# Altium PCB PROC106B_ASCII.PcbDoc (part 1 of 8)
Units mil, origin at the board's own origin, x right, y up, seen from the top; angles counter-clockwise.
Board outline 4498.18 x 1060.53 mil, 8 copper layers (Top Layer, GND1, Sig1, PWR1, PWR2, Sig2, GND2, Bottom Layer), stack 69.602 mil thick; 439 components, 327 nets, 1548 pads, 843 vias.
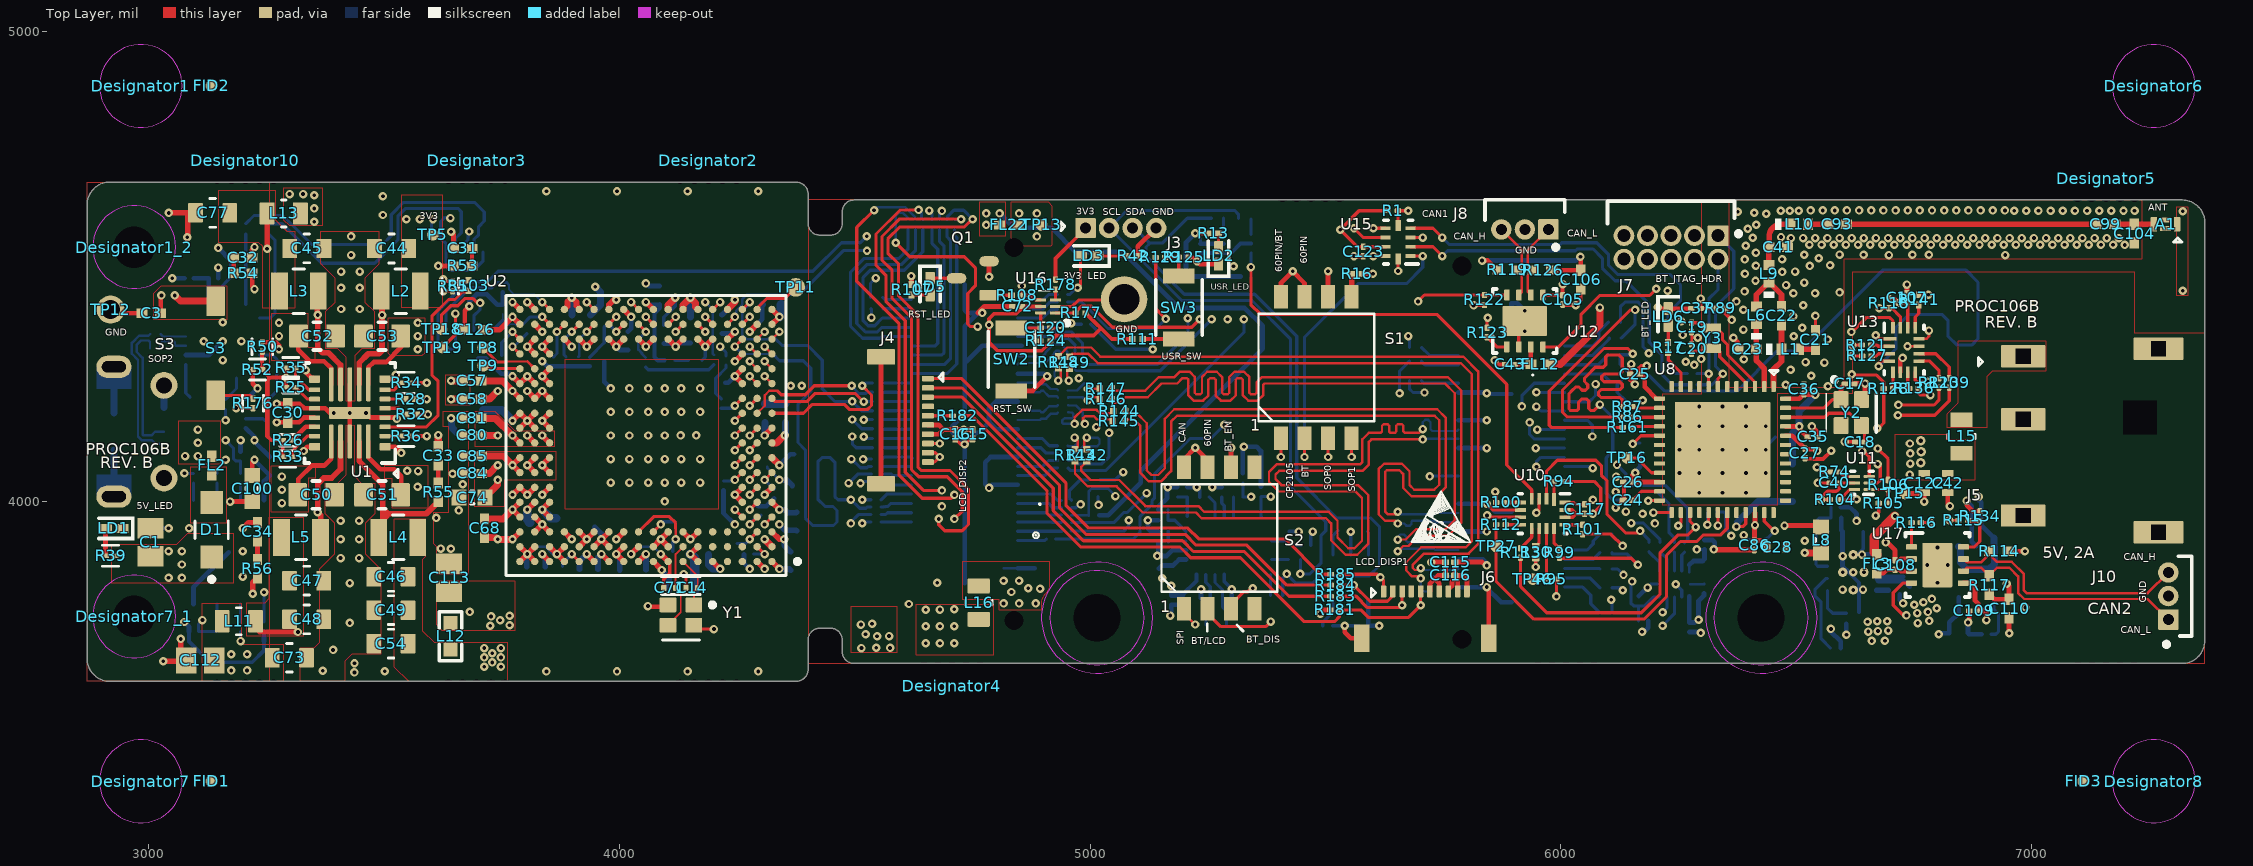
[diagram p0: Top Layer view]
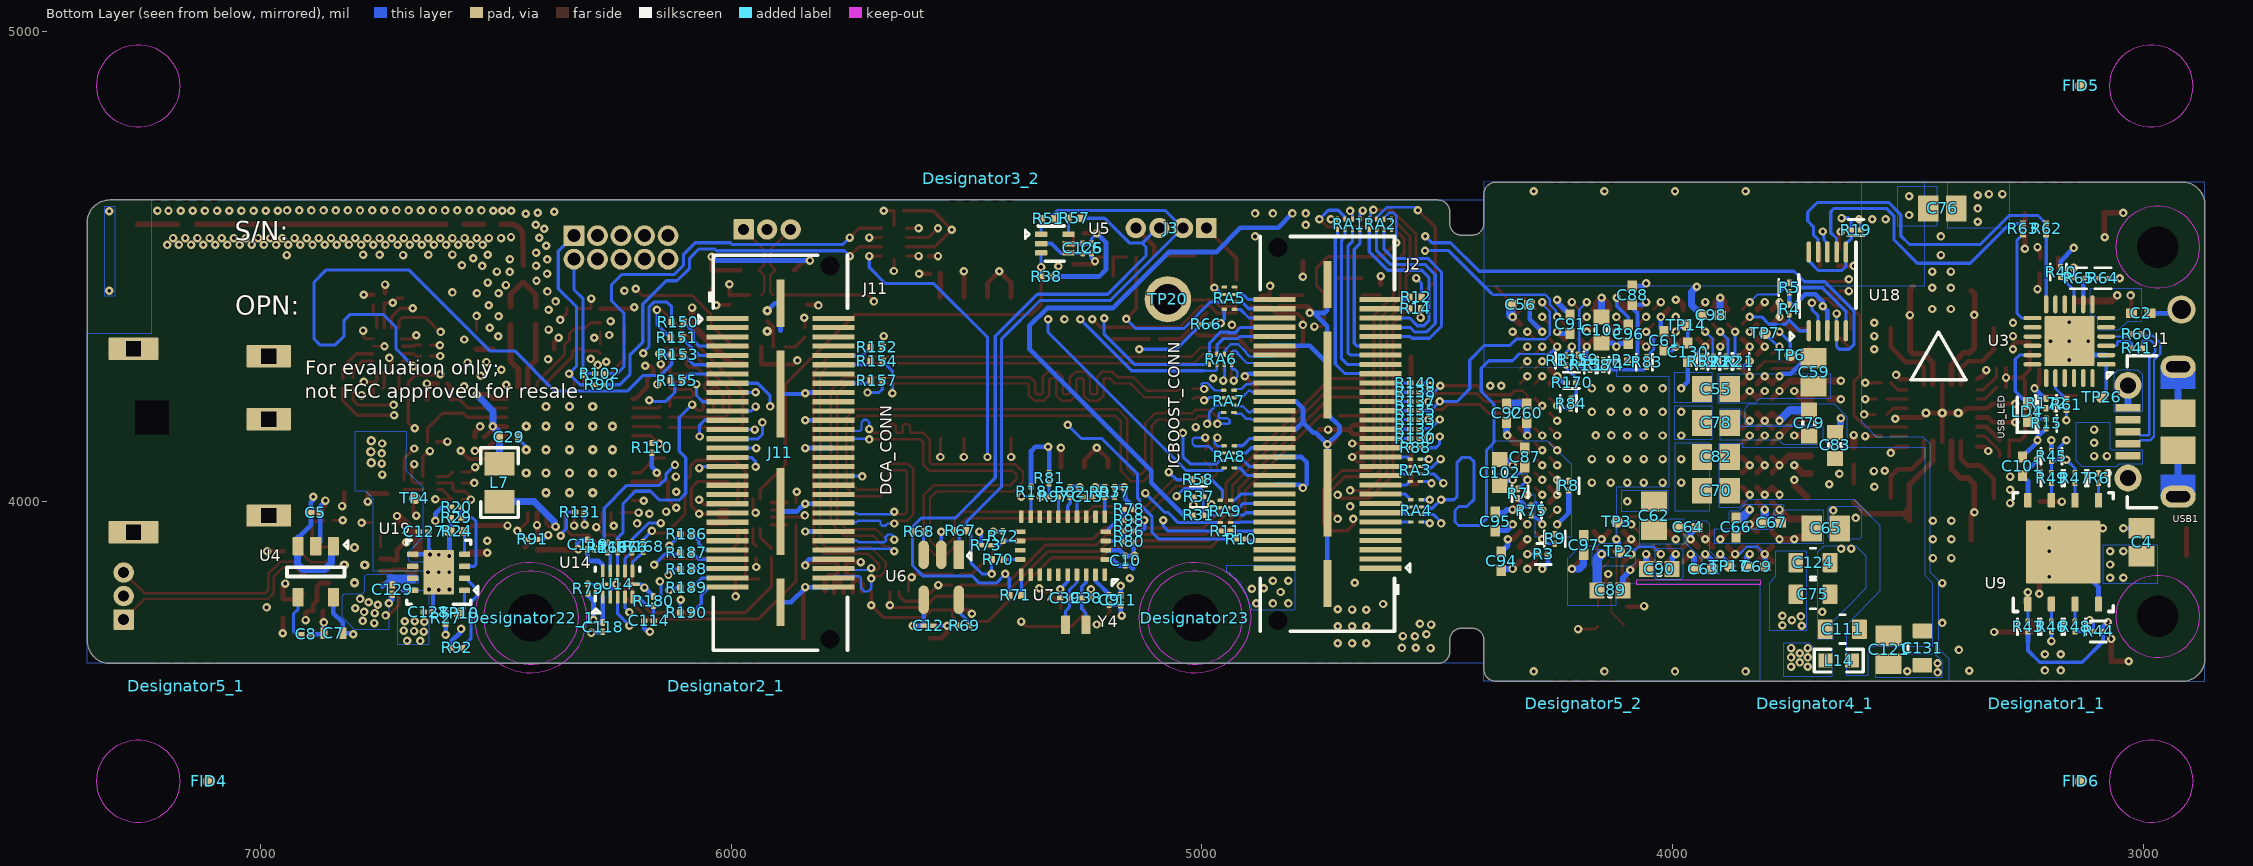
[diagram p1: Bottom Layer view, seen from below]
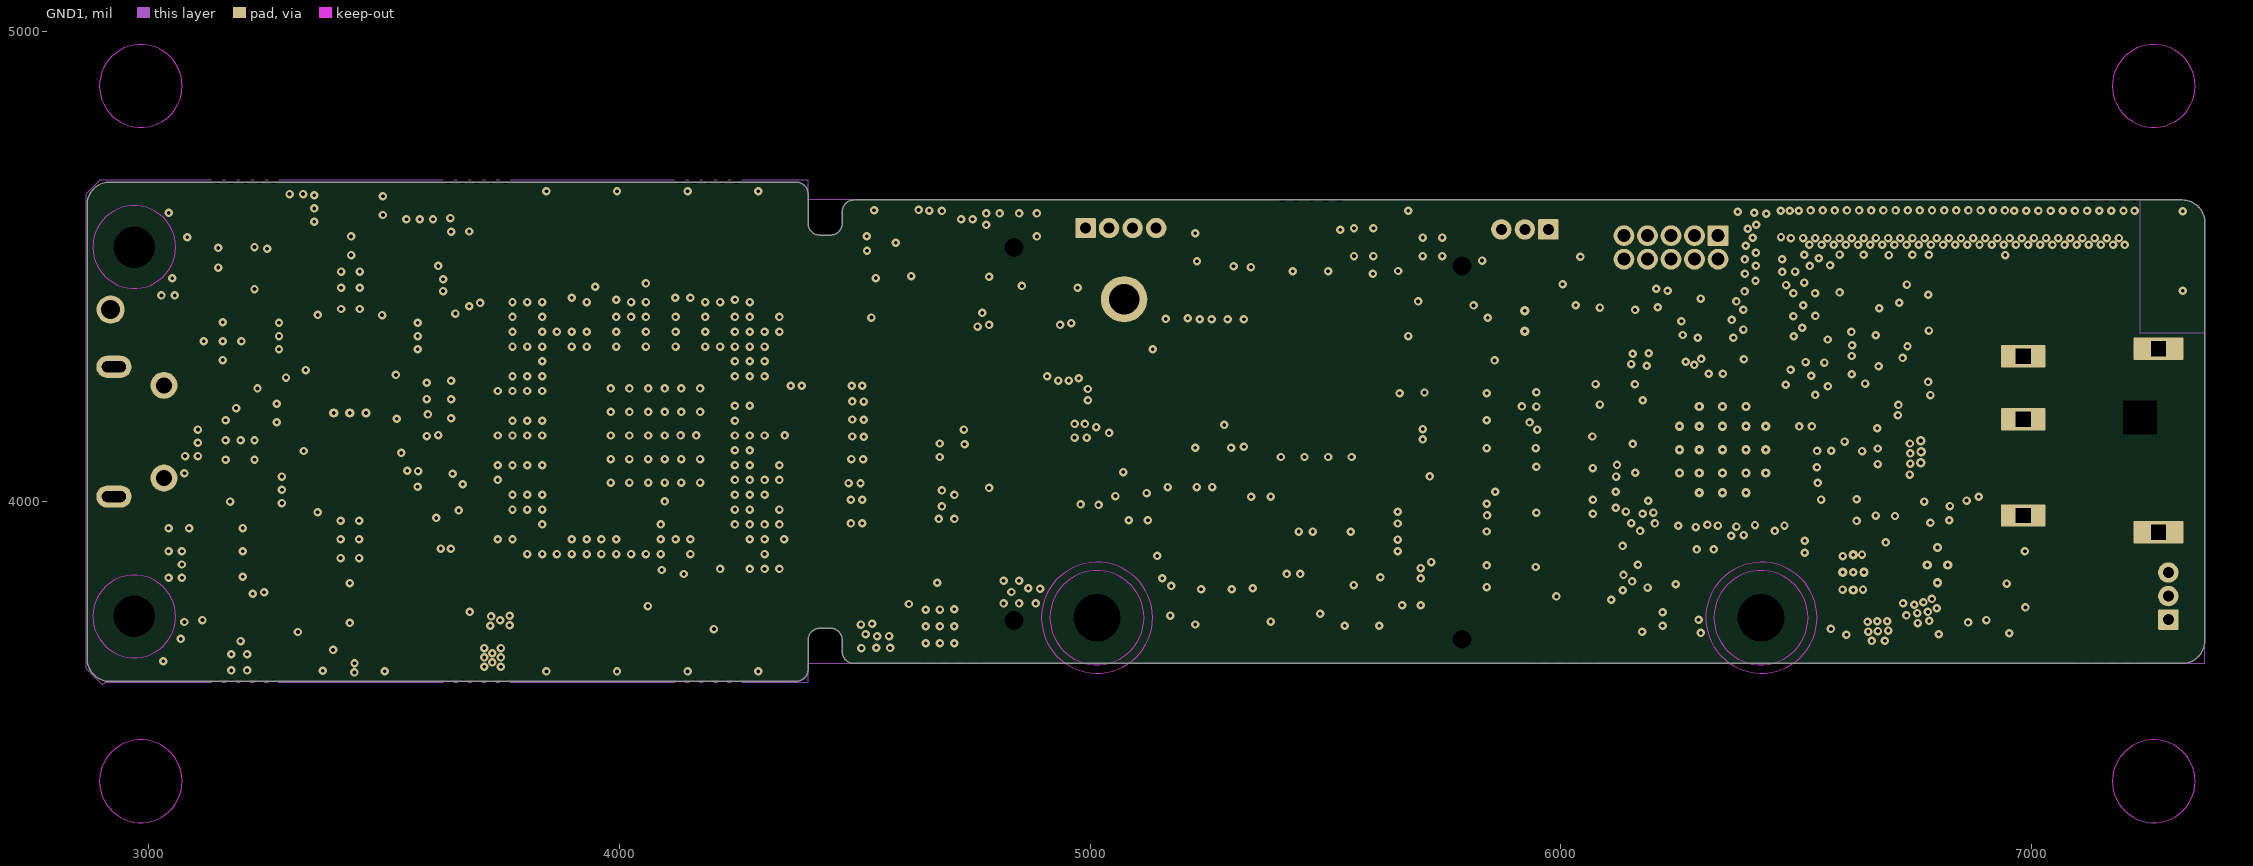
[diagram p2: GND1]
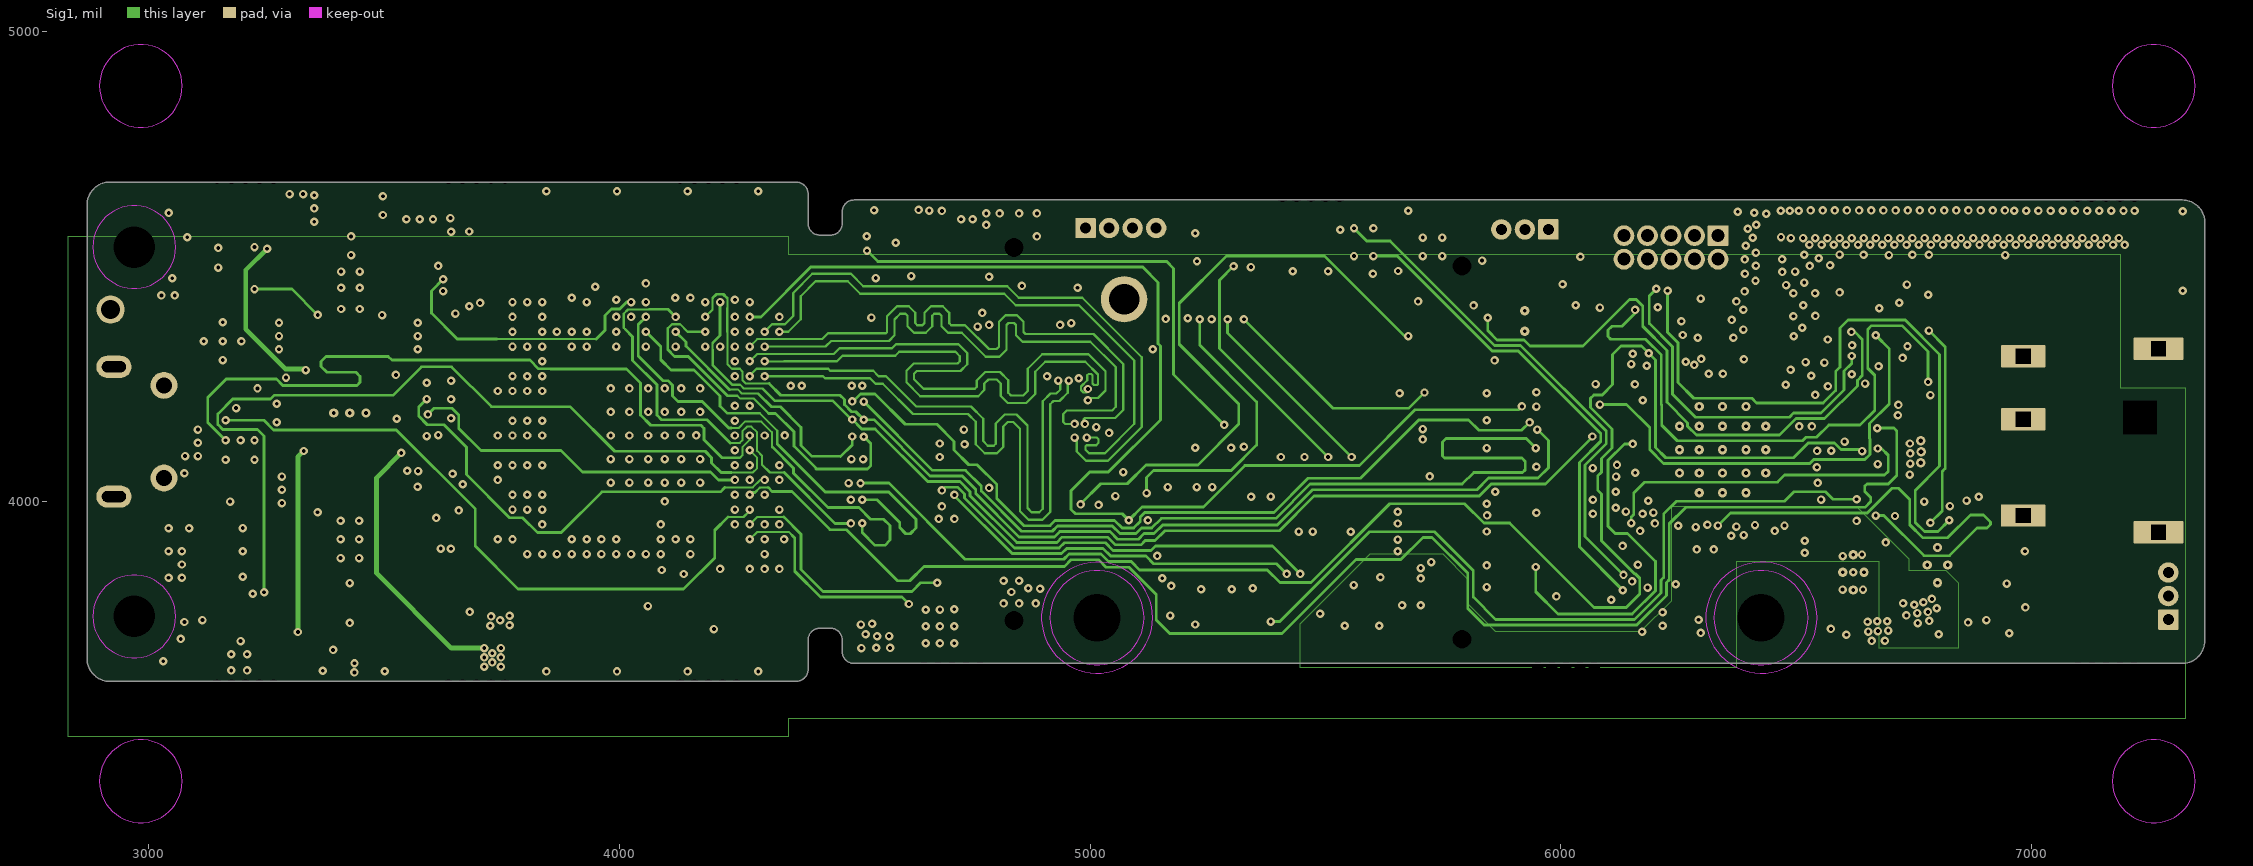
[diagram p3: Sig1]
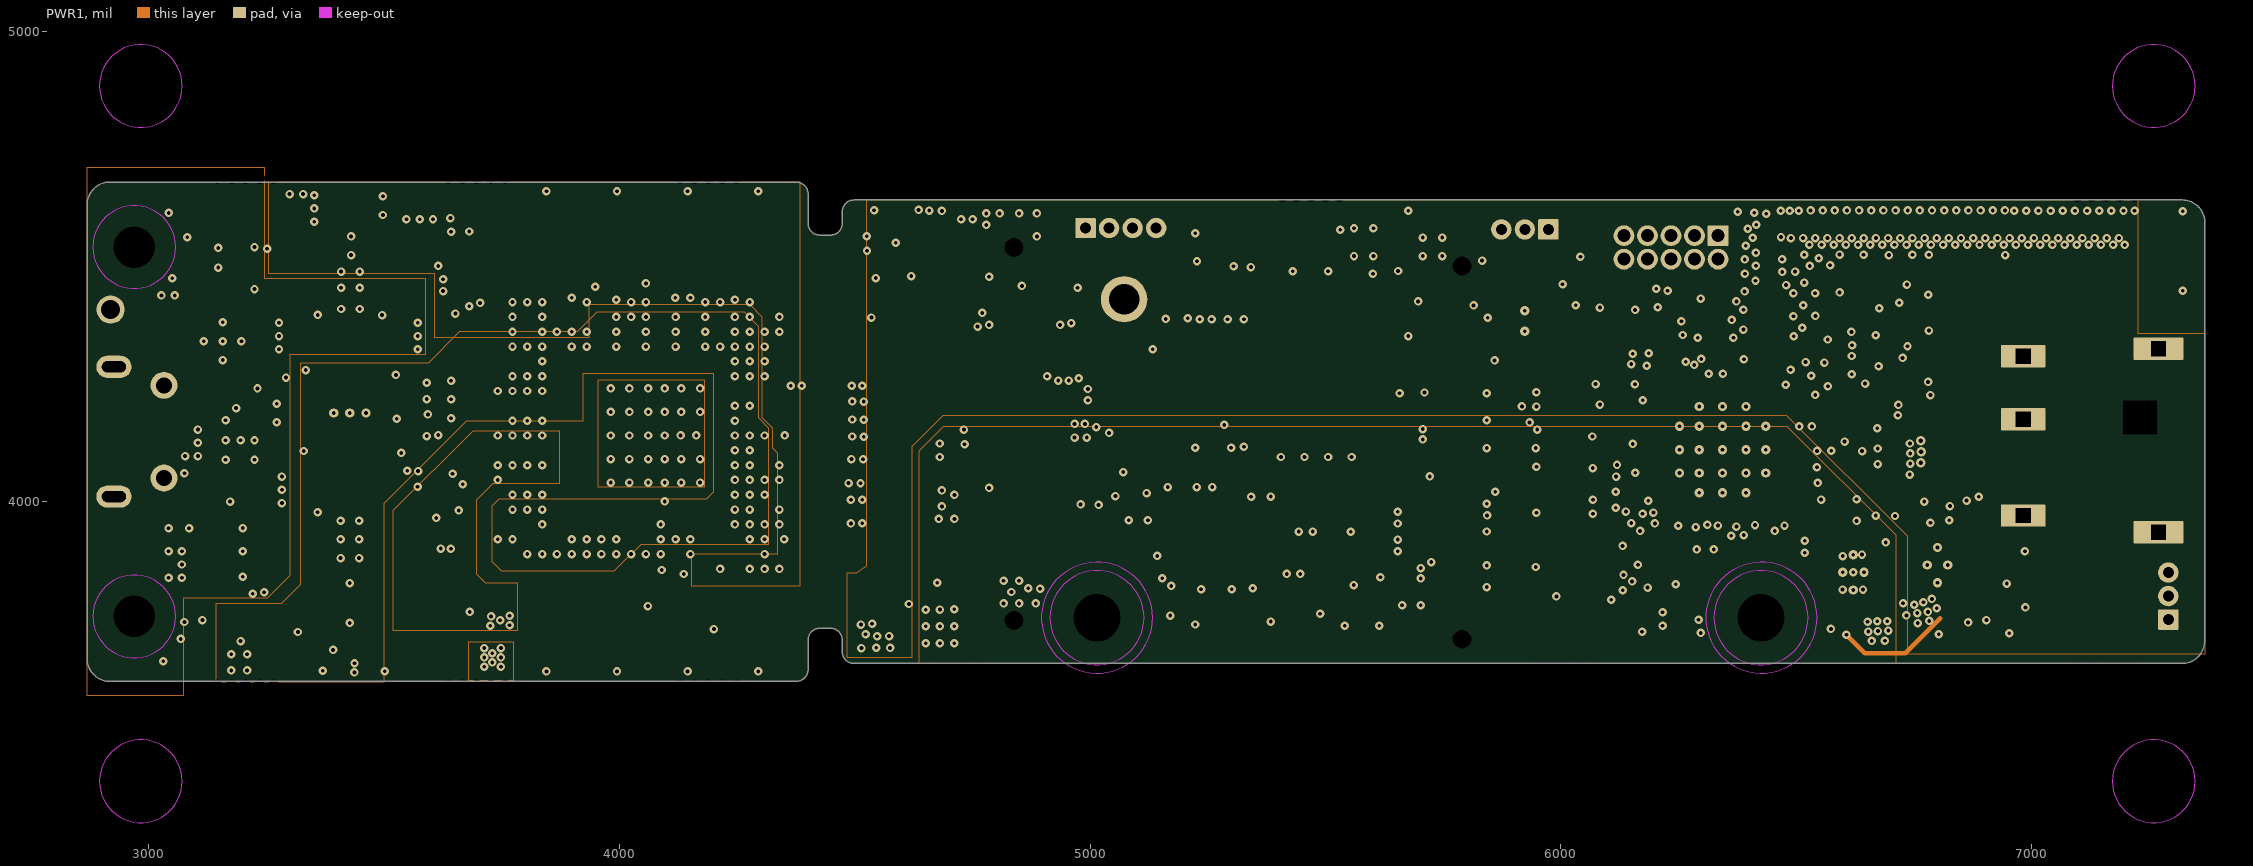
[diagram p4: PWR1]
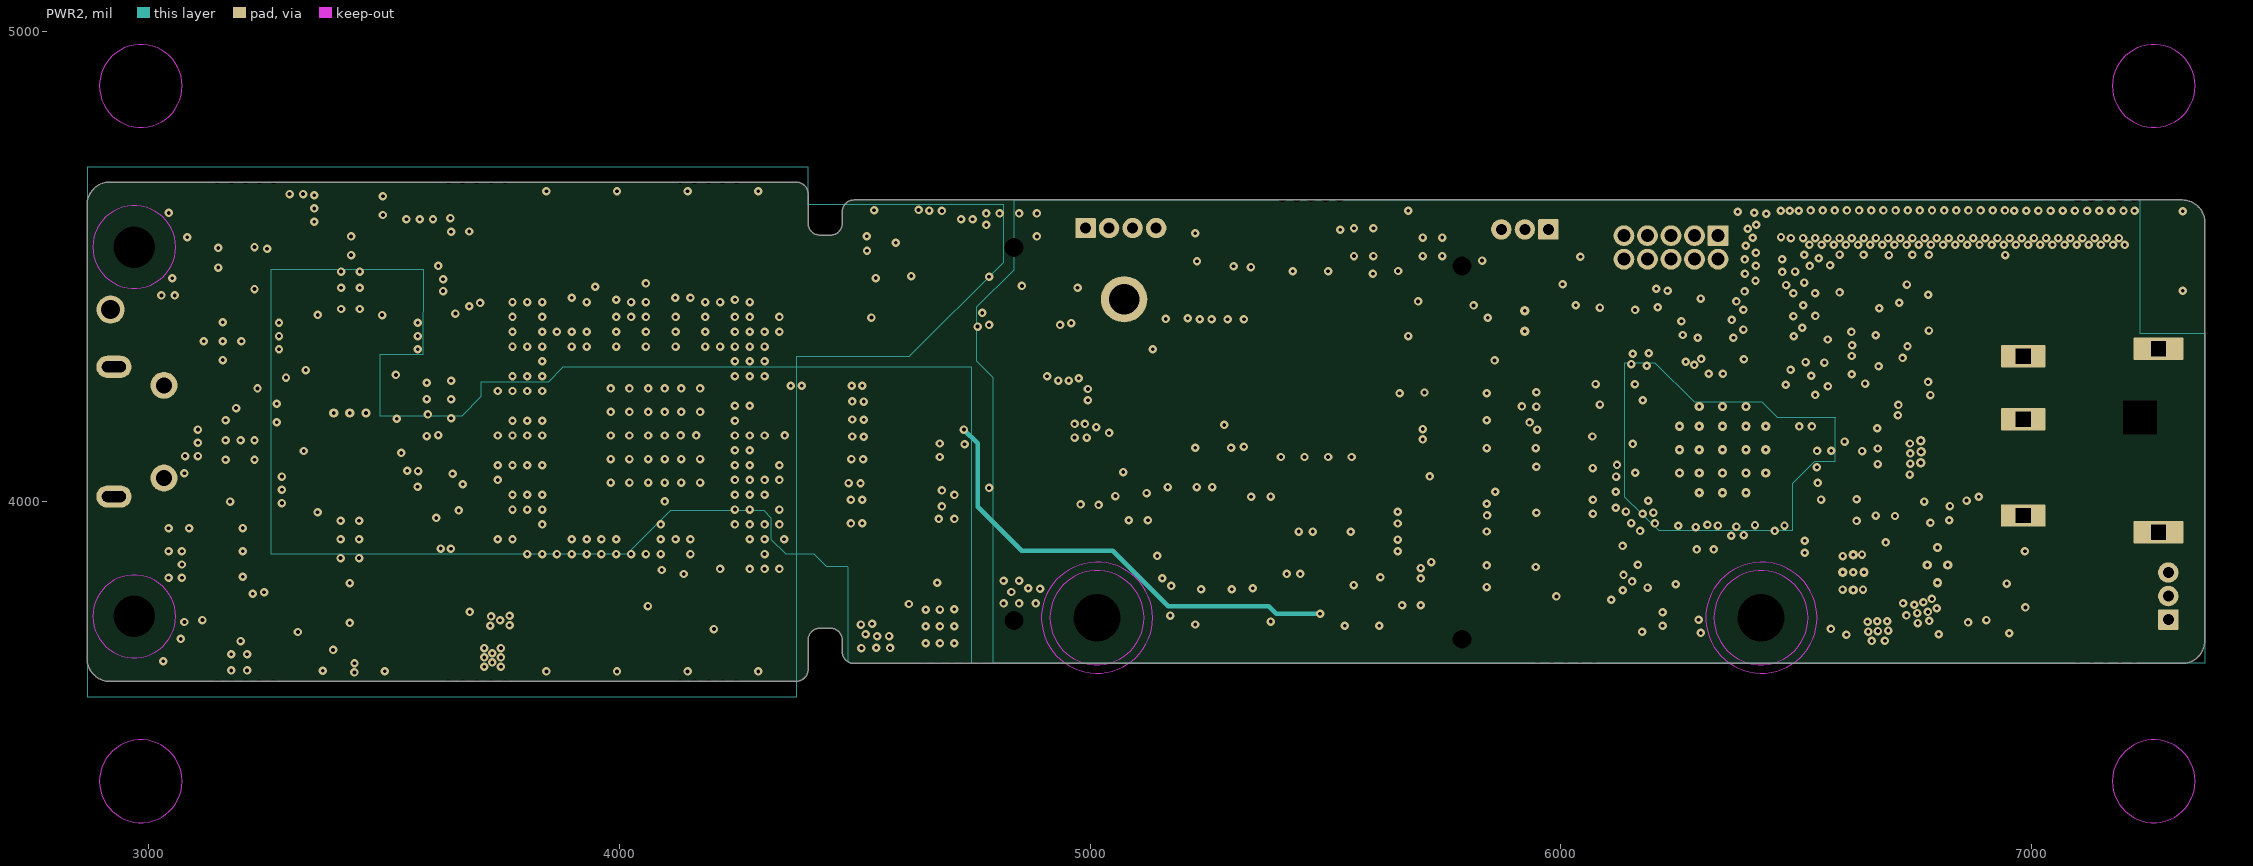
[diagram p5: PWR2]
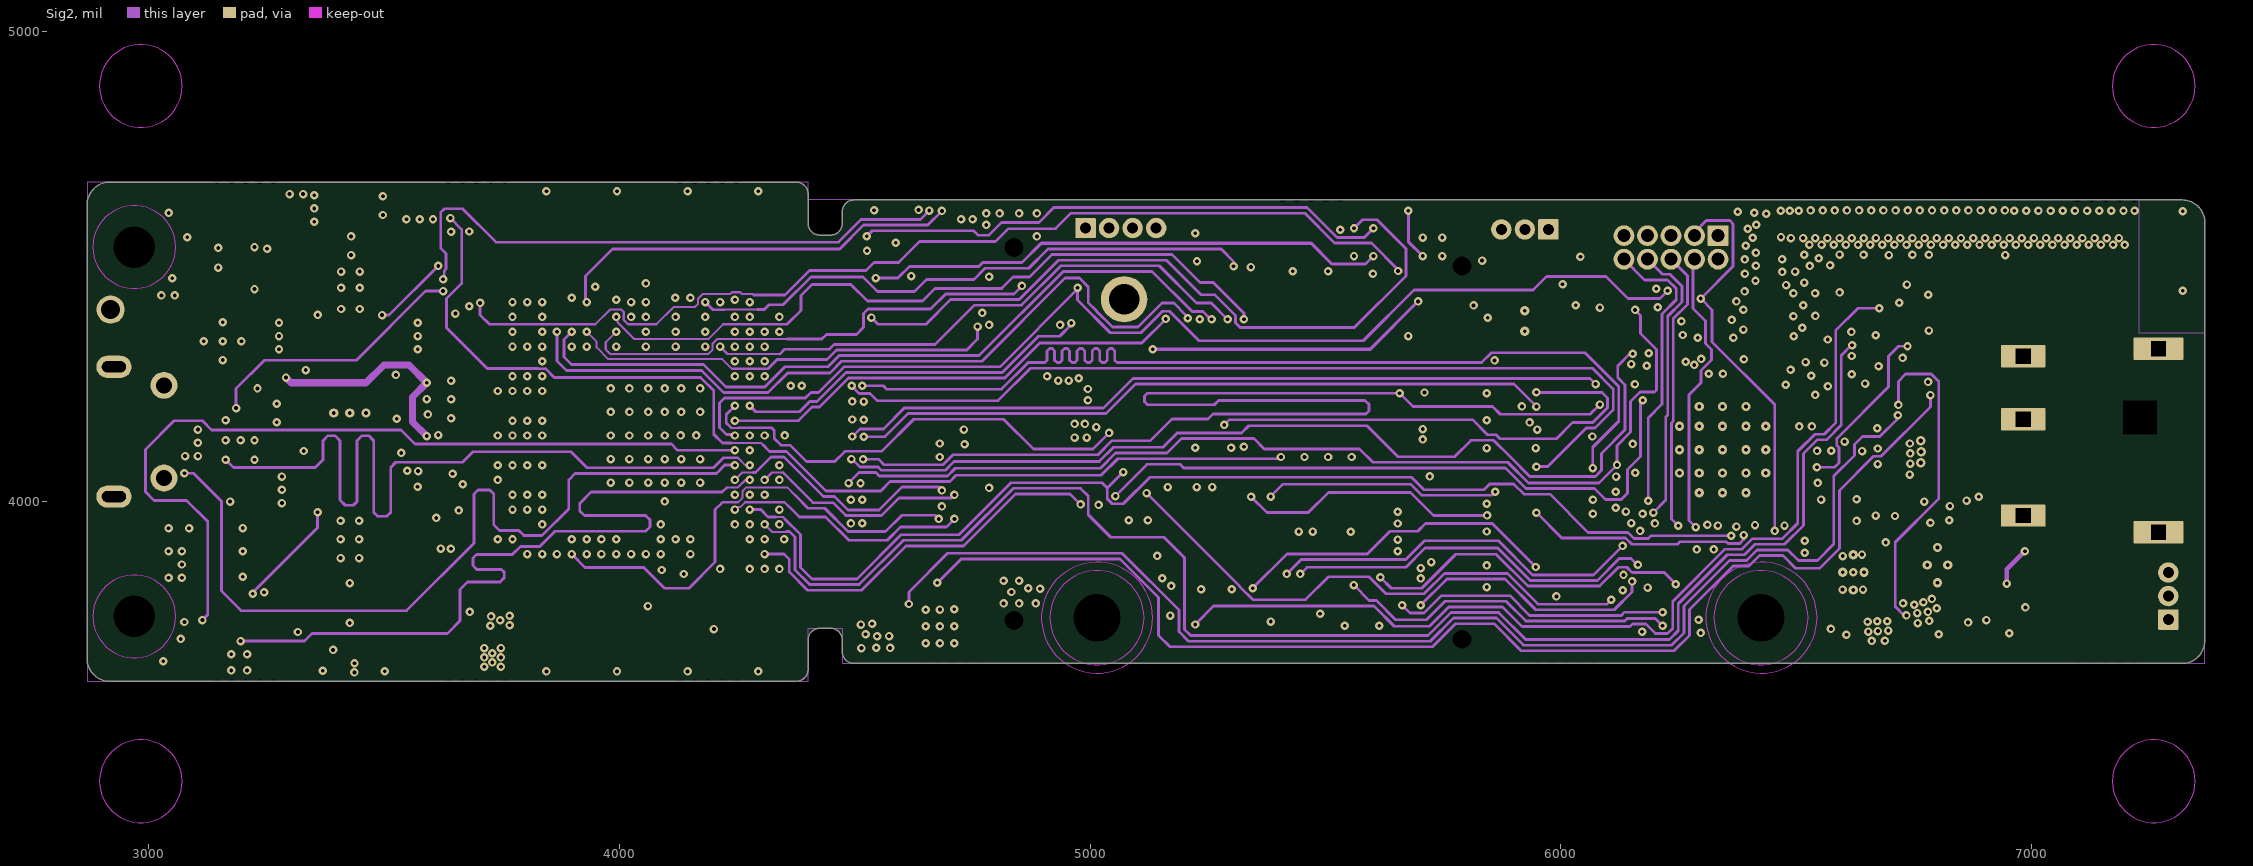
[diagram p6: Sig2]
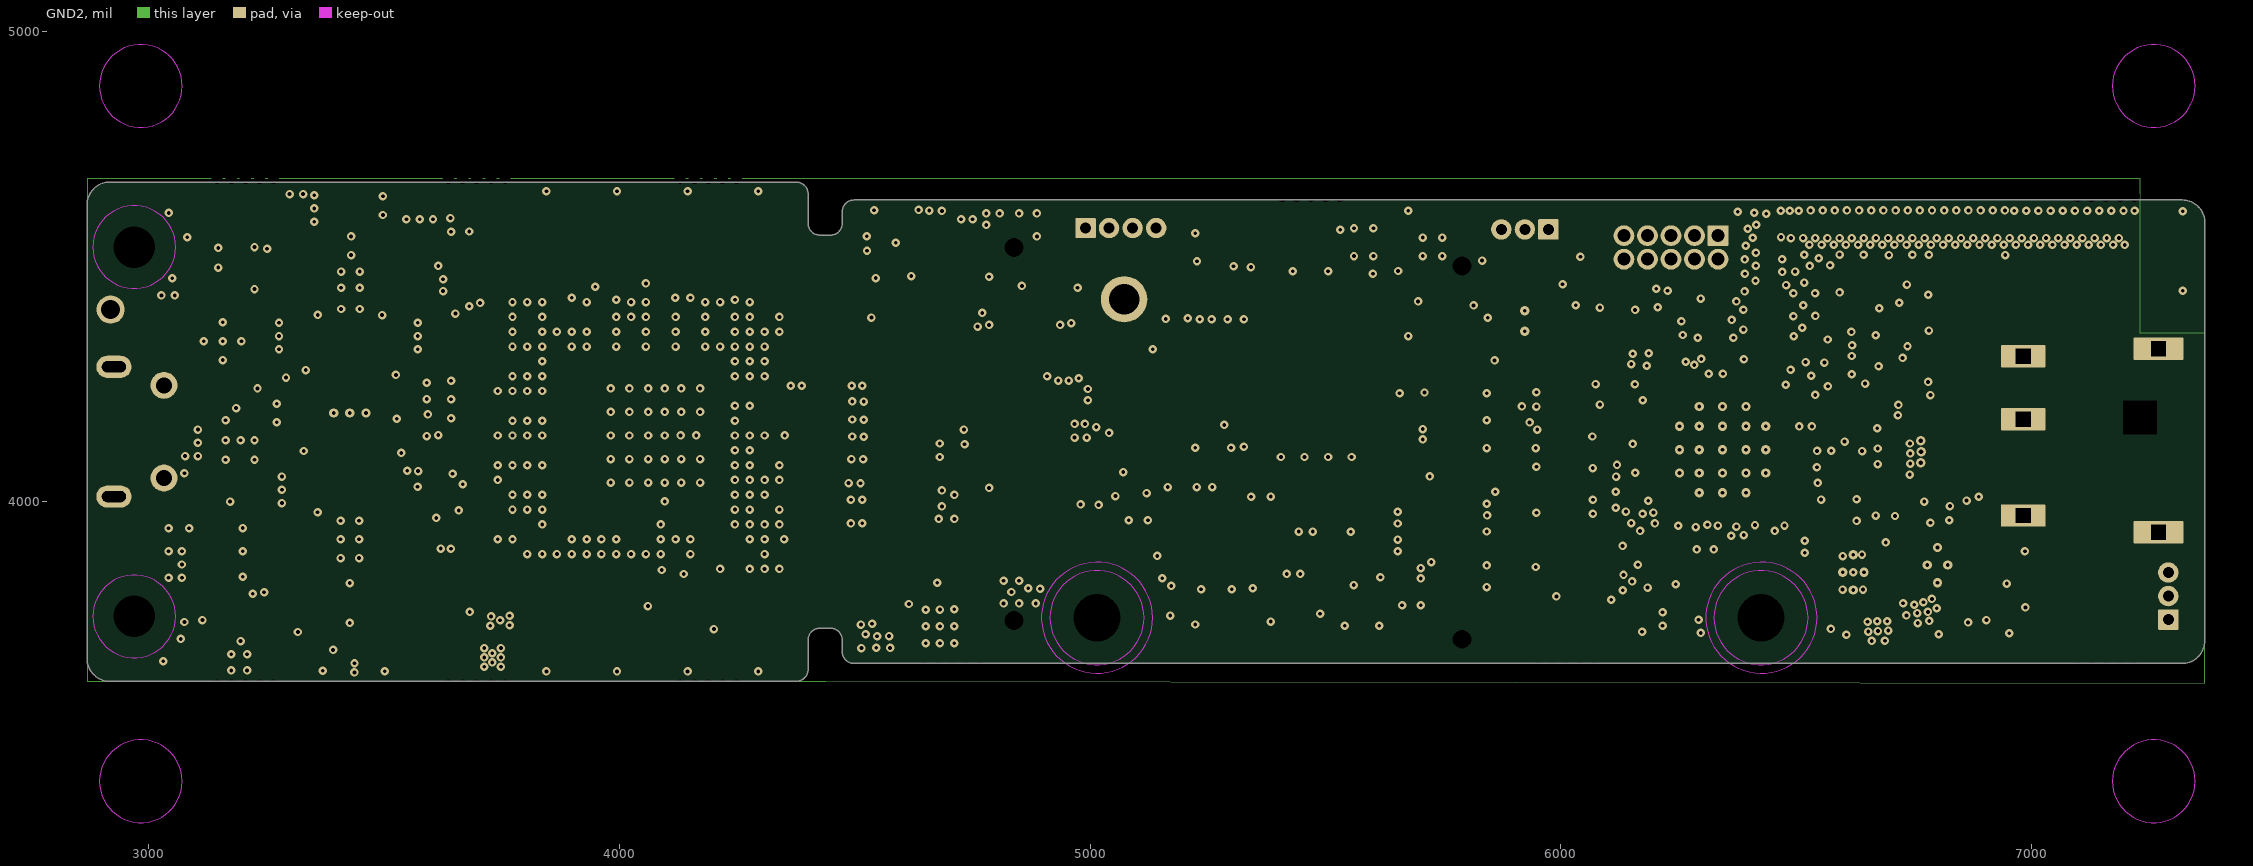
[diagram p7: GND2]

## Layer stack, top to bottom
Top Solder: solder mask 2, Solder Resist, Dk 3.9
Top Layer: signal copper 2.756
Dielectric1: prepreg 1.681, PP-006, Dk 3.79
Dielectric 1: prepreg 2.558, PP-006, Dk 3.86
GND1: signal copper 2.638
Dielectric3: core 12, Core-009, Dk 4.47
Sig1: signal copper 2.638
Dielectric2: prepreg 2.696, PP-006, Dk 4.13
Dielectric 3: prepreg 2.696, PP-006, Dk 4.13
PWR1: signal copper 2.638
Dielectric4: core 5, Core-009, Dk 4.21
PWR2: signal copper 2.638
Dielectric5: prepreg 2.696, PP-006, Dk 4.13
Dielectric 4: prepreg 2.696, PP-006, Dk 4.13
Sig2: signal copper 2.638
Dielectric8: core 12, Core-009, Dk 4.47
GND2: signal copper 2.638
Dielectric9: prepreg 2.558, PP-006, Dk 3.86
Dielectric 2: prepreg 1.681, PP-006, Dk 3.79
Bottom Layer: signal copper 2.756
Bottom Solder: solder mask 2, Solder Resist, Dk 3.9

## Board outline
2917.58,3618.9 4375.86,3618.9 4375.86,3619 ccw(c4375.86,3644) 4400.86,3644 4400.86,3706.52 cw(c4425.86,3706.52) 4425.86,3731.52 4448.63,3731.52 cw(c4448.63,3706.52) 4473.63,3706.52 4473.63,3681.91 4473.47,3681.91 ccw(c4498.47,3681.91) 4498.47,3656.91 4498.47,3656.87 7319.49,3656.87 ccw(c7319.49,3704.87) 7367.49,3704.87 7367.49,3704.83 7367.76,4593.42 7367.75,4593.44 ccw(c7319.76,4593.44) 7319.76,4641.43 4498.47,4641.43 4498.47,4641.39 ccw(c4498.47,4616.39) 4473.47,4616.39 4473.63,4591.77 cw(c4448.63,4591.77) 4448.63,4566.77 4425.86,4566.77 cw(c4425.86,4591.77) 4400.86,4591.77 4400.86,4654.3 ccw(c4375.86,4654.3) 4375.86,4679.3 4375.28,4679.43 2917.58,4679.43 ccw(c2917.58,4631.43) 2869.58,4631.43 2869.58,3666.9 ccw(c2917.58,3666.9)

## Design rules (kind name [scope] priority, off if disabled: settings)
AcuteAngle [All] p0: scope1count=1 scope1_0_kind=Board scope1_0_value=Board scope2count=1 scope2_0_kind=Board scope2_0_value=Board commentlength=0 minimum=4.50000000000000E+0001
AcuteAngle [All] p1: minimum=4.50000000000000E+0001 checktracksonly=TRUE
AssemblyTestPointUsage [All] p0: scope1count=1 scope1_0_kind=Board scope1_0_value=Board scope2count=1 scope2_0_kind=Board scope2_0_value=Board commentlength=0
AssemblyTestPointUsage [All] p1: valid=2
AssemblyTestpoint [All] p0: scope1count=1 scope1_0_kind=Board scope1_0_value=Board scope2count=1 scope2_0_kind=Board scope2_0_value=Board commentlength=0
BoardOutlineClearance [All] p0 off: scope1count=1 scope1_0_kind=Board scope1_0_value=Board scope2count=1 scope2_0_kind=Board scope2_0_value=Board commentlength=146 gap=12 // Protel DXP Scope 1 Expression Was: NOT((OnTopSilkscreen OR OnBottomSilkscreen)OR InComponentClass('FiducialMark') or InPadClass('Non Plated'))
BoardOutlineClearance BoardOutlineClearance_1 [All] p0: scope1count=1 scope1_0_kind=Net scope1_0_value=GND scope2count=1 scope2_0_kind=Board scope2_0_value=Board commentlength=0 gap=8
BoardOutlineClearance BoardOutlineClearance_1 [InNet('GND')] p1: gap=8 ignorepadtopadclearanceinfootprint=FALSE
BoardOutlineClearance [NOT((OnTopSilkscreen OR OnBottomSilkscreen)OR InComponentClass('FiducialMark') or InPadClass('Non Plated'))] p2: gap=12 ignorepadtopadclearanceinfootprint=FALSE except(0: Text-OutlineEdge)
Clearance PWR_20 [All] p0 off: scope1count=1 scope1_0_kind=Board scope1_0_value=Board scope2count=1 scope2_0_kind=NetClass scope2_0_value=PWR commentlength=56 gap=8 // Protel DXP Scope 1 Expression Was: (OnLayer('pwr2'))
Clearance 100E_1 [All] p0 off: scope1count=1 scope1_0_kind=Board scope1_0_value=Board scope2count=1 scope2_0_kind=Board scope2_0_value=Board commentlength=88 gap=8 // Protel DXP Scope 2 Expression Was: (OnLayer('Bottom Layer') or OnLayer('Top Layer'))
Clearance INNERlayer [All] p0 off: scope1count=1 scope1_0_kind=Board scope1_0_value=Board scope2count=1 scope2_0_kind=Board scope2_0_value=Board commentlength=75 gap=8 // Protel DXP Scope 1 Expression Was: (OnLayer('pwr1') or OnLayer('pwr2'))
Clearance "SAME NET" [All] p0: scope1count=1 scope1_0_kind=Board scope1_0_value=Board scope2count=1 scope2_0_kind=Board scope2_0_value=Board commentlength=0 gap=0
Clearance [All] p0: scope1count=1 scope1_0_kind=Board scope1_0_value=Board scope2count=1 scope2_0_kind=Board scope2_0_value=Board commentlength=0 gap=1
Clearance 50E_INNERlayer [All] p0 off: scope1count=1 scope1_0_kind=Board scope1_0_value=Board scope2count=1 scope2_0_kind=Board scope2_0_value=Board commentlength=75 gap=4.2 // Protel DXP Scope 1 Expression Was: (OnLayer('sig1') or OnLayer('Sig2'))
Clearance 100E [All] p0 off: scope1count=1 scope1_0_kind=Board scope1_0_value=Board scope2count=1 scope2_0_kind=Board scope2_0_value=Board commentlength=75 gap=8 // Protel DXP Scope 2 Expression Was: (OnLayer('Sig1') or OnLayer('Sig2'))
Clearance AOP_Sig [All] p0 off: scope1count=1 scope1_0_kind=Board scope1_0_value=Board scope2count=1 scope2_0_kind=Board scope2_0_value=Board commentlength=75 gap=4 // Protel DXP Scope 2 Expression Was: (OnLayer('sig1') or OnLayer('sig2'))
Clearance AOP_T-B [All] p0 off: scope1count=1 scope1_0_kind=Board scope1_0_value=Board scope2count=1 scope2_0_kind=Board scope2_0_value=Board commentlength=88 gap=4 // Protel DXP Scope 2 Expression Was: (OnLayer('Bottom Layer') or OnLayer('Top Layer'))
Clearance 90E_OUTSIDE [All] p0 off: scope1count=1 scope1_0_kind=Board scope1_0_value=Board scope2count=1 scope2_0_kind=Board scope2_0_value=Board commentlength=48 gap=6 // Protel DXP Scope 2 Expression Was: OnOutside
Clearance RF_TRACE [All] p0: scope1count=1 scope1_0_kind=NetClass scope1_0_value=RF scope2count=1 scope2_0_kind=Board scope2_0_value=Board commentlength=0 gap=4
Clearance Keepout [All] p0 off: scope1count=1 scope1_0_kind=Board scope1_0_value=Board scope2count=1 scope2_0_kind=Board scope2_0_value=Board commentlength=66 gap=0.01 // Protel DXP Scope 1 Expression Was: (OnLayer('Keep-Out Layer'))
Clearance Keepout [(OnLayer('Keep-Out Layer'))] p1: gap=0.01 ignorepadtopadclearanceinfootprint=FALSE except(5.9: THPad-THPad; 7: Arc-THPad Track-THPad THPad-Via; 8: THPad-Fill THPad-Poly THPad-Region)
Clearance RF_TRACE [InNetClass('RF')] p2: gap=4 ignorepadtopadclearanceinfootprint=FALSE except(0: Arc-Hole Track-Hole SMDPad-Hole THPad-Hole Via-Hole Fill-Hole Poly-Hole Region-Hole Text-Hole; 2: Arc-Text Track-Text SMDPad-Text THPad-Text Via-Text Fill-Text Poly-Text Region-Text Text-Text; 4.8: Track-Poly; 5: Arc-Fill Arc-Poly Arc-Region Track-Fill Track-Region; 5.9: THPad-THPad; 6: SMDPad-Fill SMDPad-Poly SMDPad-Region Via-Fill Via-Poly Via-Region; 7: Arc-THPad Track-THPad THPad-Via; 8: THPad-Fill THPad-Poly THPad-Region; 15: Fill-Fill Fill-Poly Fill-Region Poly-Poly Poly-Region Region-Region)
Clearance AOP_T-B [WithinRoom('BGA') vs (OnLayer('Bottom Layer') or OnLayer('Top Layer'))] p3: gap=4 ignorepadtopadclearanceinfootprint=TRUE except(0: Arc-Hole Track-Hole SMDPad-Hole THPad-Hole Via-Hole Fill-Hole Poly-Hole Region-Hole Text-Hole; 5.9: THPad-THPad; 7: Arc-THPad Track-THPad THPad-Via; 8: THPad-Fill THPad-Poly THPad-Region Fill-Fill Fill-Poly Fill-Region Poly-Poly Region-Region)
Clearance AOP_Sig [WithinRoom('BGA') vs (OnLayer('sig1') or OnLayer('sig2'))] p4: gap=4 ignorepadtopadclearanceinfootprint=FALSE except(0: Arc-Hole Track-Hole SMDPad-Hole THPad-Hole Via-Hole Fill-Hole Poly-Hole Region-Hole Text-Hole; 3.5: Arc-Text Track-Text SMDPad-Text THPad-Text Via-Via Via-Text Fill-Text Poly-Text Region-Text Text-Text; 3.8: SMDPad-Via; 4.5: Arc-Via Track-Via; 5.9: THPad-THPad; 7: Arc-THPad Track-THPad THPad-Via; 8: Arc-Fill Arc-Poly Arc-Region Track-Fill Track-Poly Track-Region SMDPad-THPad THPad-Fill THPad-Poly THPad-Region; 15: Fill-Fill Fill-Poly Fill-Region Poly-Poly Region-Region)
Clearance 100E [InDifferentialPairClass('100E') vs (OnLayer('Sig1') or OnLayer('Sig2'))] p5: gap=8 ignorepadtopadclearanceinfootprint=TRUE except(0: Arc-Hole Track-Hole SMDPad-Hole THPad-Hole Via-Hole Fill-Hole Poly-Hole Region-Hole Text-Hole; 2: Arc-Text Track-Text THPad-Text Via-Text Fill-Text Poly-Text Region-Text Text-Text; 4: Arc-SMDPad Track-SMDPad SMDPad-SMDPad SMDPad-THPad SMDPad-Via SMDPad-Text Via-Fill Via-Poly Via-Region; 4.5: Arc-Via Track-Via; 5.9: THPad-THPad; 6: SMDPad-Fill SMDPad-Poly SMDPad-Region Fill-Fill Fill-Poly Fill-Region Poly-Poly Poly-Region Region-Region; 7: Arc-THPad Track-THPad THPad-Via; 11: Arc-Arc Arc-Track Track-Track)
Clearance 100E_1 [InDifferentialPairClass('100E') vs (OnLayer('Bottom Layer') or OnLayer('Top Layer'))] p6: gap=8 ignorepadtopadclearanceinfootprint=FALSE except(0: Arc-Hole Track-Hole SMDPad-Hole THPad-Hole Via-Hole Fill-Hole Poly-Hole Region-Hole Text-Hole; 2: Arc-Text Track-Text THPad-Text Via-Text Fill-Text Poly-Text Region-Text Text-Text; 4: Arc-SMDPad Track-SMDPad SMDPad-SMDPad SMDPad-THPad SMDPad-Via SMDPad-Text Via-Fill Via-Poly Via-Region; 5: Arc-Via Track-Via; 5.9: THPad-THPad; 6: SMDPad-Fill SMDPad-Poly SMDPad-Region Fill-Fill Fill-Poly Fill-Region Poly-Poly Poly-Region Region-Region; 7: Arc-THPad Track-THPad THPad-Via; 10.65: Arc-Arc Arc-Track Track-Track)
Clearance 50E_INNERlayer [(OnLayer('sig1') or OnLayer('Sig2'))] p7: gap=4.2 ignorepadtopadclearanceinfootprint=TRUE except(0: Arc-Hole Track-Hole SMDPad-Hole THPad-Hole Via-Hole Fill-Hole Poly-Hole Region-Hole Text-Hole; 2: SMDPad-Text Fill-Text Poly-Text Region-Text Text-Text; 4: Via-Fill Via-Poly Via-Region Poly-Region; 4.35: Arc-Via Track-Via; 5.9: THPad-THPad; 5.95: Arc-Arc Arc-Track Track-Track; 6: SMDPad-Fill SMDPad-Poly SMDPad-Region; 7: Arc-THPad Track-THPad THPad-Via; 8: Arc-Fill Arc-Poly Arc-Region Track-Fill Track-Poly Track-Region THPad-Fill THPad-Poly THPad-Region; 12: Fill-Fill Fill-Poly Fill-Region Poly-Poly Region-Region)
Clearance PWR_20 [(OnLayer('pwr2')) vs InNetClass('PWR')] p8: gap=8 ignorepadtopadclearanceinfootprint=TRUE except(0: Arc-Hole Track-Hole SMDPad-Hole THPad-Hole Via-Hole Fill-Hole Poly-Hole Region-Hole Text-Hole; 2: SMDPad-Text Fill-Text Poly-Text Region-Text Text-Text; 4.2: Arc-Text Track-Text THPad-Text Via-Via Via-Text; 5: THPad-Fill THPad-Poly THPad-Region; 5.9: THPad-THPad; 6: Arc-Via Arc-Fill Arc-Poly Arc-Region Track-Via Track-Fill Track-Poly Track-Region; 7: THPad-Via; 10: Via-Fill Via-Poly Via-Region; 20: Fill-Fill Fill-Poly Fill-Region Poly-Poly Poly-Region Region-Region)
Clearance INNERlayer [(OnLayer('pwr1') or OnLayer('pwr2'))] p9: gap=8 ignorepadtopadclearanceinfootprint=TRUE except(0: Arc-Hole Track-Hole SMDPad-Hole THPad-Hole Via-Hole Fill-Hole Poly-Hole Region-Hole Text-Hole; 2: SMDPad-Text Fill-Text Poly-Text Region-Text Text-Text; 4: Via-Fill Via-Poly Via-Region; 4.2: Arc-Text Track-Text THPad-Text Via-Via Via-Text; 5: THPad-Fill THPad-Poly THPad-Region; 5.9: THPad-THPad; 6: Arc-Via Arc-Fill Arc-Poly Arc-Region Track-Via Track-Fill Track-Poly Track-Region; 7: THPad-Via; 20: Fill-Fill Fill-Poly Fill-Region Poly-Poly Poly-Region Region-Region)
Clearance 90E_OUTSIDE [InDifferentialPairClass('90E') vs OnOutside] p10: gap=6 ignorepadtopadclearanceinfootprint=TRUE except(0: Arc-Hole Track-Hole SMDPad-Hole THPad-Hole Via-Hole Fill-Fill Fill-Poly Fill-Region Fill-Hole Poly-Poly Poly-Region Poly-Hole Region-Region Region-Hole Text-Hole; 2: Arc-Text Track-Text SMDPad-Text THPad-Text Via-Text Fill-Text Poly-Text Region-Text Text-Text; 4: Arc-SMDPad Track-SMDPad SMDPad-SMDPad Via-Via Via-Fill Via-Poly Via-Region; 4.5: Arc-Arc Arc-Track Arc-Via Track-Track Track-Via; 5.9: THPad-THPad; 7: Arc-THPad Track-THPad SMDPad-THPad THPad-Via; 8: SMDPad-Via THPad-Fill THPad-Poly THPad-Region)
Clearance [All] p11: gap=1 ignorepadtopadclearanceinfootprint=TRUE except(0: Arc-Hole Track-Hole SMDPad-Hole THPad-Hole Via-Hole Fill-Hole Poly-Hole Region-Hole Text-Hole; 4: Arc-SMDPad Track-SMDPad SMDPad-SMDPad SMDPad-Via Via-Via Via-Fill Via-Poly Via-Region Poly-Region; 4.2: Arc-Via Track-Via; 5: Arc-Fill Arc-Poly Arc-Region Track-Fill Track-Poly Track-Region; 5.85: Arc-Arc Arc-Track Track-Track; 5.9: THPad-THPad; 6: SMDPad-Fill SMDPad-Poly SMDPad-Region; 7: Arc-THPad Track-THPad SMDPad-THPad THPad-Via; 8: THPad-Fill THPad-Poly THPad-Region; 12: Fill-Fill Fill-Poly Fill-Region Poly-Poly Region-Region)
Clearance "SAME NET" [All] p12: gap=0 ignorepadtopadclearanceinfootprint=FALSE except(0.5: SMDPad-Text; 5.9: THPad-THPad)
ComponentClearance ComponentClearance_THtoTH [All] p0 off: scope1count=1 scope1_0_kind=Board scope1_0_value=Board scope2count=1 scope2_0_kind=Board scope2_0_value=Board commentlength=54 gap=20 collisioncheckmode=3 // Protel DXP Scope 2 Expression Was: IsThruComponent
ComponentClearance ComponentClearance_THtoSMT [All] p0 off: scope1count=1 scope1_0_kind=Board scope1_0_value=Board scope2count=1 scope2_0_kind=Board scope2_0_value=Board commentlength=53 gap=5 collisioncheckmode=3 // Protel DXP Scope 2 Expression Was: IsSMTComponent
ComponentClearance ComponentClearance_SmallPassives [All] p0 off: scope1count=1 scope1_0_kind=Board scope1_0_value=Board scope2count=1 scope2_0_kind=Board scope2_0_value=Board commentlength=508 gap=10 collisioncheckmode=3 // Protel DXP Scope 2 Expression Was: HasFootprint('0201*') or HasFootprint('0402*') or HasFootprint('0508') or HasFootprint('0603*') or HasFootprint('0612') or HasFootprint('0805*') or HasFootprint('0815*') or HasFootprint('0830*') or HasFootprint('1206*') or HasFootprint('1210*') or HasFootprint('1808*') or HasFootprint('1812*') or HasFootprint('1825*') or HasFootprint('2010*') or HasFootprint('2220*') or HasFootprint('2225*') or HasFootprint('2512*') or HasFootprint('2728*') or HasFootprint('3518*')
ComponentClearance ComponentClearance_MountingHoles [All] p0: scope1count=1 scope1_0_kind=ComponentClass scope1_0_value="Mounting Holes" scope2count=1 scope2_0_kind=Board scope2_0_value=Board commentlength=0 gap=20 collisioncheckmode=3
ComponentClearance ComponentClearance_ScrewToNut [All] p0 off: scope1count=1 scope1_0_kind=Board scope1_0_value=Board scope2count=1 scope2_0_kind=Board scope2_0_value=Board commentlength=71 gap=5 collisioncheckmode=3 // Protel DXP Scope 2 Expression Was: (HasFootprint('Keystone_1902C'))
ComponentClearance ComponentClearance_Logo [All] p0: scope1count=1 scope1_0_kind=ComponentClass scope1_0_value=Logo scope2count=1 scope2_0_kind=Board scope2_0_value=Board commentlength=0 gap=50 collisioncheckmode=3
ComponentClearance ComponentClearance_Shunt [All] p0: scope1count=1 scope1_0_kind=ComponentClass scope1_0_value=Header scope2count=1 scope2_0_kind=ComponentClass scope2_0_value=Shunt commentlength=0 gap=1 collisioncheckmode=3
ComponentClearance ComponentClearance_MountingHoles_FiducialMarks [All] p0: scope1count=1 scope1_0_kind=ComponentClass scope1_0_value="Mounting Holes" scope2count=1 scope2_0_kind=ComponentClass scope2_0_value=FiducialMark commentlength=0 gap=50 collisioncheckmode=3
ComponentClearance [All] p0: scope1count=1 scope1_0_kind=Board scope1_0_value=Board scope2count=1 scope2_0_kind=Board scope2_0_value=Board commentlength=0 gap=1 collisioncheckmode=3
ComponentClearance ComponentClearance_R188_204 [All] p0: scope1count=1 scope1_0_kind=Component scope1_0_value=R188 scope2count=1 scope2_0_kind=Component scope2_0_value=R204 commentlength=0 gap=-1 collisioncheckmode=3
ComponentClearance ComponentClearance_R199_187 [All] p0 off: scope1count=1 scope1_0_kind=Board scope1_0_value=Board scope2count=1 scope2_0_kind=Board scope2_0_value=Board commentlength=80 gap=-1 collisioncheckmode=3 // Protel DXP Scope 1 Expression Was: InComponent('J11') or InComponent('TP20')
ComponentClearance ComponentClearance_R199_187 [InComponent('J11') or InComponent('TP20')] p1: gap=-1 collisioncheckmode=3 verticalgap=10 showdistances=FALSE
ComponentClearance ComponentClearance_R188_204 [InComponent('R188') vs InComponent('R204')] p2: gap=-1 collisioncheckmode=3 verticalgap=10 showdistances=FALSE
ComponentClearance [All] p3: gap=1 collisioncheckmode=3 verticalgap=10 showdistances=FALSE
ComponentClearance ComponentClearance_MountingHoles_FiducialMarks [InComponentClass('Mounting Holes') vs InComponentClass('FiducialMark')] p4: gap=50 collisioncheckmode=3 verticalgap=10 showdistances=FALSE
ComponentClearance ComponentClearance_Shunt [InComponentClass('Header') vs InComponentClass('Shunt')] p5: gap=1 collisioncheckmode=3 verticalgap=0 showdistances=FALSE
ComponentClearance ComponentClearance_Logo [InComponentClass('Logo')] p6: gap=50 collisioncheckmode=3 verticalgap=10 showdistances=FALSE
ComponentClearance ComponentClearance_ScrewToNut [(HasFootprint('NY PMS 440 0025 PH')) vs (HasFootprint('Keystone_1902C'))] p7: gap=5 collisioncheckmode=3 verticalgap=10 showdistances=FALSE
ComponentClearance ComponentClearance_MountingHoles [InComponentClass('Mounting Holes')] p8: gap=20 collisioncheckmode=3 verticalgap=100000 showdistances=FALSE
ComponentClearance ComponentClearance_SmallPassives [HasFootprint('0201*') or HasFootprint('0402*') or HasFootprint('0508') or HasFootprint('0603*') or HasFootprint('0612') or HasFootprint('0805*') or HasFootprint('0815*') or HasFootprint('0830*') or HasFootprint('1206*') or HasFootprint('1210*') or HasFootprint('1808*') or HasFootprint('1812*') or HasFootprint('1825*') or HasFootprint('2010*') or HasFootprint('2220*') or HasFootprint('2225*') or HasFootprint('2512*') or HasFootprint('2728*') or HasFootprint('3518*') vs HasFootprint('0201*') or HasFootprint('0402*') or HasFootprint('0508') or HasFootprint('0603*') or HasFootprint('0612') or HasFootprint('0805*') or HasFootprint('0815*') or HasFootprint('0830*') or HasFootprint('1206*') or HasFootprint('1210*') or HasFootprint('1808*') or HasFootprint('1812*') or HasFootprint('1825*') or HasFootprint('2010*') or HasFootprint('2220*') or HasFootprint('2225*') or HasFootprint('2512*') or HasFootprint('2728*') or HasFootprint('3518*')] p9: gap=10 collisioncheckmode=3 verticalgap=10 showdistances=FALSE
ComponentClearance ComponentClearance_THtoSMT [IsThruComponent vs IsSMTComponent] p10: gap=5 collisioncheckmode=3 verticalgap=20 showdistances=FALSE
ComponentClearance ComponentClearance_THtoTH [IsThruComponent vs IsThruComponent] p11: gap=20 collisioncheckmode=3 verticalgap=30 showdistances=FALSE
DiffPairsRouting Diff_120E [All] p0 off: scope1count=1 scope1_0_kind=Board scope1_0_value=Board scope2count=1 scope2_0_kind=Board scope2_0_value=Board commentlength=70 // Protel DXP Scope 1 Expression Was: InDifferentialPairClass('120E')
DiffPairsRouting Diff_100E [All] p0 off: scope1count=1 scope1_0_kind=Board scope1_0_value=Board scope2count=1 scope2_0_kind=Board scope2_0_value=Board commentlength=70 // Protel DXP Scope 1 Expression Was: InDifferentialPairClass('100E')
DiffPairsRouting Diff_90E [All] p0 off: scope1count=1 scope1_0_kind=Board scope1_0_value=Board scope2count=1 scope2_0_kind=Board scope2_0_value=Board commentlength=69 // Protel DXP Scope 1 Expression Was: InDifferentialPairClass('90E')
DiffPairsRouting Diff_100E [InDifferentialPairClass('100E')] p1: maxlimit=11.2 minlimit=8.6 mostfreqgap=10 toplayer_maxgap=8.6 toplayer_prefgap=8.6 toplayer_minwidth=5.1 toplayer_maxwidth=5.1 toplayer_prefwidth=5.1 midlayer1_mingap=10 midlayer1_maxgap=10 midlayer1_minwidth=15 midlayer1_maxwidth=15 midlayer1_prefwidth=15 midlayer2_mingap=11.2 midlayer2_prefgap=11.2 midlayer2_minwidth=4.5 midlayer2_maxwidth=4.8 midlayer2_prefwidth=4.8 midlayer3_mingap=10 midlayer3_maxgap=10 midlayer3_minwidth=15 midlayer3_maxwidth=15 midlayer3_prefwidth=15 midlayer6_mingap=10 midlayer6_maxgap=10 midlayer6_minwidth=15 midlayer6_maxwidth=15 midlayer6_prefwidth=15 midlayer7_mingap=11.2 midlayer7_prefgap=11.2 midlayer7_minwidth=4.5 midlayer7_maxwidth=4.8 midlayer7_prefwidth=4.8 midlayer8_mingap=10 midlayer8_maxgap=10 midlayer8_minwidth=15 midlayer8_maxwidth=15 midlayer8_prefwidth=15 bottomlayer_maxgap=8.6 bottomlayer_prefgap=8.6 bottomlayer_minwidth=5.1 bottomlayer_maxwidth=5.1 bottomlayer_prefwidth=5.1 maxuncoupledlength=500
DiffPairsRouting Diff_90E [InDifferentialPairClass('90E')] p2: maxlimit=100 minlimit=5 mostfreqgap=10 toplayer_maxgap=5 toplayer_prefgap=5 toplayer_minwidth=5 toplayer_maxwidth=5 toplayer_prefwidth=5 midlayer1_mingap=10 midlayer1_minwidth=15 midlayer1_maxwidth=15 midlayer1_prefwidth=15 midlayer2_mingap=7.4 midlayer2_maxgap=7.4 midlayer2_prefgap=7.4 midlayer2_minwidth=5 midlayer2_maxwidth=5 midlayer2_prefwidth=5 midlayer3_mingap=10 midlayer3_minwidth=15 midlayer3_maxwidth=15 midlayer3_prefwidth=15 midlayer6_mingap=10 midlayer6_minwidth=15 midlayer6_maxwidth=15 midlayer6_prefwidth=15 midlayer7_mingap=7.4 midlayer7_maxgap=7.4 midlayer7_prefgap=7.4 midlayer7_minwidth=5 midlayer7_maxwidth=5 midlayer7_prefwidth=5 midlayer8_mingap=10 midlayer8_minwidth=15 midlayer8_maxwidth=15 midlayer8_prefwidth=15 bottomlayer_maxgap=5 bottomlayer_prefgap=5 bottomlayer_minwidth=5 bottomlayer_maxwidth=5 bottomlayer_prefwidth=5 maxuncoupledlength=1000
DiffPairsRouting Diff_120E [InDifferentialPairClass('120E')] p3: maxlimit=10 minlimit=6.1 mostfreqgap=10 toplayer_mingap=7.15 toplayer_maxgap=7.15 toplayer_prefgap=7.15 toplayer_minwidth=5.2 toplayer_maxwidth=5.2 toplayer_prefwidth=5.2 midlayer1_mingap=10 midlayer1_minwidth=15 midlayer1_maxwidth=15 midlayer1_prefwidth=15 midlayer2_mingap=10 midlayer2_minwidth=15 midlayer2_maxwidth=15 midlayer2_prefwidth=15 midlayer3_mingap=10 midlayer3_minwidth=15 midlayer3_maxwidth=15 midlayer3_prefwidth=15 midlayer6_mingap=10 midlayer6_minwidth=15 midlayer6_maxwidth=15 midlayer6_prefwidth=15 midlayer7_mingap=10 midlayer7_minwidth=15 midlayer7_maxwidth=15 midlayer7_prefwidth=15 midlayer8_mingap=10 midlayer8_minwidth=15 midlayer8_maxwidth=15 midlayer8_prefwidth=15 bottomlayer_maxgap=6.1 bottomlayer_prefgap=6.1 bottomlayer_minwidth=4 bottomlayer_maxwidth=4 bottomlayer_prefwidth=4 maxuncoupledlength=500
FabricationTestPointUsage TestPointUsage [All] p0: scope1count=1 scope1_0_kind=Board scope1_0_value=Board scope2count=1 scope2_0_kind=Board scope2_0_value=Board commentlength=0 valid=2 allowmultiple=FALSE
FabricationTestPointUsage TestPointUsage [All] p1: valid=2 allowmultiple=FALSE
FabricationTestpoint Testpoint [All] p0: scope1count=1 scope1_0_kind=Board scope1_0_value=Board scope2count=1 scope2_0_kind=Board scope2_0_value=Board commentlength=0 side=3 testpointundercomponent=TRUE minsize=40 maxsize=100 preferedsize=60 minholesize=0 maxholesize=40 preferedholesize=32 testpointgrid=1
FabricationTestpoint Testpoint [All] p1: side=3 testpointundercomponent=TRUE minsize=40 maxsize=100 preferedsize=60 minholesize=0 maxholesize=40 preferedholesize=32 testpointgrid=1 allowsidetop=TRUE allowsidebottom=TRUE usegrid=TRUE gridtolerance=0.01
FanoutControl Fanout_Small [All] p0 off: scope1count=1 scope1_0_kind=Board scope1_0_value=Board scope2count=1 scope2_0_kind=Board scope2_0_value=Board commentlength=84 // Protel DXP Scope 1 Expression Was: (CompPinCount < 5)   Fanout_Small (Default Rule)
FanoutControl Fanout_Default [All] p0: scope1count=1 scope1_0_kind=Board scope1_0_value=Board scope2count=1 scope2_0_kind=Board scope2_0_value=Board commentlength=30 // Fanout_Default (Default Rule)
FanoutControl Fanout_SOIC [All] p0 off: scope1count=1 scope1_0_kind=Board scope1_0_value=Board scope2count=1 scope2_0_kind=Board scope2_0_value=Board commentlength=71 // Protel DXP Scope 1 Expression Was: IsSOIC   Fanout_SOIC (Default Rule)
FanoutControl Fanout_BGA [All] p0 off: scope1count=1 scope1_0_kind=Board scope1_0_value=Board scope2count=1 scope2_0_kind=Board scope2_0_value=Board commentlength=69 // Protel DXP Scope 1 Expression Was: IsBGA   Fanout_BGA (Default Rule)
FanoutControl Fanout_LCC [All] p0 off: scope1count=1 scope1_0_kind=Board scope1_0_value=Board scope2count=1 scope2_0_kind=Board scope2_0_value=Board commentlength=69 // Protel DXP Scope 1 Expression Was: IsLCC   Fanout_LCC (Default Rule)
FanoutControl Fanout_LCC [IsLCC] p1: bgadir=Out bgaviamode=Centered fanoutstyle=Auto fanoutdirection=Alternating viagrid=1 // Fanout_LCC (Default Rule)
FanoutControl Fanout_BGA [IsBGA] p2: bgadir=Out bgaviamode=Centered fanoutstyle=Auto fanoutdirection=Alternating viagrid=1 // Fanout_BGA (Default Rule)
FanoutControl Fanout_Default [All] p4: bgadir=Out bgaviamode=Centered fanoutstyle=Auto fanoutdirection=Alternating viagrid=1 // Fanout_Default (Default Rule)
FanoutControl Fanout_Small [(CompPinCount < 5)] p5: bgadir=Out bgaviamode=Centered fanoutstyle=Auto fanoutdirection=OutThenIn viagrid=1 // Fanout_Small (Default Rule)
Height [All] p0: scope1count=1 scope1_0_kind=Board scope1_0_value=Board scope2count=1 scope2_0_kind=Board scope2_0_value=Board commentlength=0
HoleSize [All] p0: scope1count=1 scope1_0_kind=Board scope1_0_value=Board scope2count=1 scope2_0_kind=Board scope2_0_value=Board commentlength=0 absolutevalues=TRUE maxlimit=251 minlimit=5.9 maxpercent=80.000 minpercent=20.000
HoleSize [All] p1: absolutevalues=TRUE maxlimit=251 minlimit=5.9 maxpercent=80.000 minpercent=20.000
HoleToHoleClearance [All] p0 off: scope1count=1 scope1_0_kind=Board scope1_0_value=Board scope2count=1 scope2_0_kind=Board scope2_0_value=Board commentlength=78 // Protel DXP Scope 1 Expression Was: All and  (not InPadClass('Non Plated'))
HoleToHoleClearance [All and  (not InPadClass('Non Plated'))] p1: gap=10 allowstackedmicrovias=TRUE
LayerPairs [All] p0: scope1count=1 scope1_0_kind=Board scope1_0_value=Board scope2count=1 scope2_0_kind=Board scope2_0_value=Board commentlength=0 enforce=TRUE
MatchedLengths U13-J2 [All] p0 off: scope1count=1 scope1_0_kind=Board scope1_0_value=Board scope2count=1 scope2_0_kind=Board scope2_0_value=Board commentlength=63 tolerance=400 amplitude=200 gap=20 style=90-Degree // Protel DXP Scope 1 Expression Was: InxSignalClass('U13-J2')
MatchedLengths U13-U8 [All] p0 off: scope1count=1 scope1_0_kind=Board scope1_0_value=Board scope2count=1 scope2_0_kind=Board scope2_0_value=Board commentlength=63 tolerance=400 amplitude=200 gap=20 style=90-Degree // Protel DXP Scope 1 Expression Was: InxSignalClass('U13-U8')
MatchedLengths U13-J11 [All] p0 off: scope1count=1 scope1_0_kind=Board scope1_0_value=Board scope2count=1 scope2_0_kind=Board scope2_0_value=Board commentlength=64 tolerance=400 amplitude=200 gap=20 style=90-Degree // Protel DXP Scope 1 Expression Was: InxSignalClass('U13-J11')
MatchedLengths [All] p0: scope1count=1 scope1_0_kind=NetClass scope1_0_value=LVDS_IC scope2count=1 scope2_0_kind=Board scope2_0_value=Board commentlength=0 tolerance=20 amplitude=200 gap=20 style=90-Degree
MatchedLengths USB [All] p0 off: scope1count=1 scope1_0_kind=Board scope1_0_value=Board scope2count=1 scope2_0_kind=Board scope2_0_value=Board commentlength=60 tolerance=5 amplitude=200 gap=20 style=90-Degree // Protel DXP Scope 1 Expression Was: InxSignalClass('USB')
MatchedLengths JTAG [All] p0 off: scope1count=1 scope1_0_kind=Board scope1_0_value=Board scope2count=1 scope2_0_kind=Board scope2_0_value=Board commentlength=61 tolerance=100 amplitude=200 gap=20 style=90-Degree // Protel DXP Scope 1 Expression Was: InxSignalClass('JTAG')
MatchedLengths SPI [All] p0 off: scope1count=1 scope1_0_kind=Board scope1_0_value=Board scope2count=1 scope2_0_kind=Board scope2_0_value=Board commentlength=70 tolerance=200 amplitude=200 gap=20 style=90-Degree // Protel DXP Scope 1 Expression Was: InxSignalClass('SPI & HOSTINT')
MatchedLengths QSPI [All] p0 off: scope1count=1 scope1_0_kind=Board scope1_0_value=Board scope2count=1 scope2_0_kind=Board scope2_0_value=Board commentlength=61 tolerance=100 amplitude=200 gap=20 style=90-Degree // Protel DXP Scope 1 Expression Was: InxSignalClass('QSPI')
MatchedLengths U13-J11 [InxSignalClass('U13-J11')] p1: tolerance=400 checknetsindiffpair=FALSE checkdiffpairvsdiffpair=TRUE checkxsignals=TRUE checkothers=TRUE
MatchedLengths U13-J2 [InxSignalClass('U13-J2')] p2: tolerance=400 checknetsindiffpair=FALSE checkdiffpairvsdiffpair=TRUE checkxsignals=TRUE checkothers=TRUE
MatchedLengths U13-U8 [InxSignalClass('U13-U8')] p3: tolerance=400 checknetsindiffpair=FALSE checkdiffpairvsdiffpair=TRUE checkxsignals=TRUE checkothers=TRUE
MatchedLengths [InNetClass('LVDS_IC')] p4: tolerance=20 checknetsindiffpair=FALSE checkdiffpairvsdiffpair=TRUE checkxsignals=TRUE checkothers=TRUE
MatchedLengths USB [InxSignalClass('USB')] p5: tolerance=5 checknetsindiffpair=TRUE checkdiffpairvsdiffpair=FALSE checkxsignals=FALSE checkothers=FALSE
MatchedLengths QSPI [InxSignalClass('QSPI')] p6: tolerance=100 checknetsindiffpair=FALSE checkdiffpairvsdiffpair=TRUE checkxsignals=TRUE checkothers=TRUE
MatchedLengths SPI [InxSignalClass('SPI & HOSTINT')] p7: tolerance=200 checknetsindiffpair=FALSE checkdiffpairvsdiffpair=TRUE checkxsignals=TRUE checkothers=TRUE
MatchedLengths JTAG [InxSignalClass('JTAG')] p8: tolerance=100 checknetsindiffpair=FALSE checkdiffpairvsdiffpair=TRUE checkxsignals=TRUE checkothers=TRUE
MinimumAnnularRing [All] p0: scope1count=1 scope1_0_kind=Board scope1_0_value=Board scope2count=1 scope2_0_kind=Board scope2_0_value=Board commentlength=0 minimumring=3
MinimumAnnularRing MinimumAnnularRing_ThermalPadVias [All] p0 off: scope1count=1 scope1_0_kind=Board scope1_0_value=Board scope2count=1 scope2_0_kind=Board scope2_0_value=Board commentlength=63 minimumring=3 // Protel DXP Scope 1 Expression Was: IsVia and InAnyComponent
MinimumAnnularRing MinimumAnnularRing_ThermalPadVias [IsVia and InAnyComponent] p1: minimumring=3
MinimumAnnularRing [All] p2: minimumring=3
MinimumSolderMaskSliver [All] p0: scope1count=1 scope1_0_kind=Board scope1_0_value=Board scope2count=1 scope2_0_kind=Board scope2_0_value=Board commentlength=0
MinimumSolderMaskSliver [All] p1: minsoldermaskwidth=2.9
NetAntennae [All] p0: scope1count=1 scope1_0_kind=Board scope1_0_value=Board scope2count=1 scope2_0_kind=Board scope2_0_value=Board commentlength=0
PasteMaskExpansion [All] p0: scope1count=1 scope1_0_kind=Board scope1_0_value=Board scope2count=1 scope2_0_kind=Board scope2_0_value=Board commentlength=0 expansion=0
PlaneClearance [All] p0: scope1count=1 scope1_0_kind=Board scope1_0_value=Board scope2count=1 scope2_0_kind=Board scope2_0_value=Board commentlength=0 clearance=20
PlaneConnect [All] p0: scope1count=1 scope1_0_kind=Board scope1_0_value=Board scope2count=1 scope2_0_kind=Board scope2_0_value=Board commentlength=0 planeconnectstyle=Direct reliefexpansion=10 reliefentries=4 reliefconductorwidth=10 reliefairgap=10
PlaneConnect [All] p1: planeconnectstyle=Direct reliefexpansion=10 reliefentries=4 reliefconductorwidth=10 reliefairgap=10
PolygonConnect [All] p0: scope1count=1 scope1_0_kind=Board scope1_0_value=Board scope2count=1 scope2_0_kind=Board scope2_0_value=Board commentlength=0 connectstyle=Direct reliefconductorwidth=10 reliefentries=4 polygonreliefangle="90 Angle"
PolygonConnect [All] p1: connectstyle=Direct reliefconductorwidth=10 reliefentries=4 polygonreliefangle="90 Angle" airgapwidth=10
RoomDefinition PROC106B_Hardware [All] p0 off: scope1count=1 scope1_0_kind=ComponentClass scope1_0_value=PROC106B_Hardware scope2count=1 scope2_0_kind=Board scope2_0_value=Board commentlength=0 region_x1=44324542 region_y1=53246462 region_x2=50581612 region_y2=59382522 confinementstyle=ConfineIn
RoomDefinition PROC106B_Hardware [InComponentClass('PROC106B_Hardware')] p1 off: confinementstyle=ConfineIn formatcopy=TRUE lockcomponents=FALSE outline 3741.3,4404.25 4366.16,4404.25 4366.16,3790.65 3740.45,3790.65
RoutingCorners [All] p0: scope1count=1 scope1_0_kind=Board scope1_0_value=Board scope2count=1 scope2_0_kind=Board scope2_0_value=Board commentlength=0 cornerstyle=45-Degree minsetback=100 maxsetback=100
RoutingLayers [All] p0: scope1count=1 scope1_0_kind=Board scope1_0_value=Board scope2count=1 scope2_0_kind=Board scope2_0_value=Board commentlength=0 top layer=Automatic mid layer 1=Automatic mid layer 2=Automatic mid layer 3=Automatic mid layer 6=Automatic mid layer 7=Automatic mid layer 8=Automatic bottom layer=Automatic
RoutingPriority [All] p0: scope1count=1 scope1_0_kind=Board scope1_0_value=Board scope2count=1 scope2_0_kind=Board scope2_0_value=Board commentlength=0
RoutingTopology [All] p0: scope1count=1 scope1_0_kind=Board scope1_0_value=Board scope2count=1 scope2_0_kind=Board scope2_0_value=Board commentlength=0 topology=Shortest
RoutingVias [All] p0: scope1count=1 scope1_0_kind=Board scope1_0_value=Board scope2count=1 scope2_0_kind=Board scope2_0_value=Board commentlength=0 holewidth=8 width=18 viastyle="Through Hole" minholewidth=7.87 minwidth=17 maxholewidth=40 maxwidth=30
RoutingVias ThermalPadVias [All] p0 off: scope1count=1 scope1_0_kind=Board scope1_0_value=Board scope2count=1 scope2_0_kind=Board scope2_0_value=Board commentlength=63 holewidth=7.87 width=19.68 viastyle="Through Hole" minholewidth=7.87 minwidth=19.68 maxholewidth=12.99 maxwidth=23.62 // Protel DXP Scope 1 Expression Was: IsVia and InAnyComponent
RoutingVias [All] p1: holewidth=8 width=18 viastyle="Through Hole" minholewidth=7.87 minwidth=17 maxholewidth=40 maxwidth=30
RoutingVias ThermalPadVias [IsVia and InAnyComponent] p2: holewidth=7.87 width=19.68 viastyle="Through Hole" minholewidth=7.87 minwidth=19.68 maxholewidth=12.99 maxwidth=23.62
ShortCircuit [All] p0: scope1count=1 scope1_0_kind=Board scope1_0_value=Board scope2count=1 scope2_0_kind=Board scope2_0_value=Board commentlength=0 allowed=FALSE
SilkToBoardRegionClearance [All] p0 off: scope1count=1 scope1_0_kind=Board scope1_0_value=Board scope2count=1 scope2_0_kind=Board scope2_0_value=Board commentlength=130 // Protel DXP Scope 1 Expression Was: Not ((IsComment or IsDesignator) And (Hide <> 'False')) and not InRegion(1000,500,4000,800)
SilkToBoardRegionClearance [Not ((IsComment or IsDesignator) And (Hide <> 'False')) and not InRegion(1000,500,4000,800)] p1:
SilkToSilkClearance [All] p0: scope1count=1 scope1_0_kind=Board scope1_0_value=Board scope2count=1 scope2_0_kind=Board scope2_0_value=Board commentlength=0
SilkToSilkClearance [All] p1: silktosilkclearance=3
SilkToSolderMaskClearance "Silk to Solder Mask Opening" [All] p0: scope1count=1 scope1_0_kind=Board scope1_0_value=Board scope2count=1 scope2_0_kind=Board scope2_0_value=Board commentlength=0
SilkToSolderMaskClearance SilkToComponentPadClearance [All] p0 off: scope1count=1 scope1_0_kind=Board scope1_0_value=Board scope2count=1 scope2_0_kind=Board scope2_0_value=Board commentlength=87 // Protel DXP Scope 1 Expression Was: (IsPad or IsFill or IsRegion) and InAnycomponent
SilkToSolderMaskClearance SilkToComponentPadClearance [(IsPad or IsFill or IsRegion) and InAnycomponent] p1: minsilkscreentomaskgap=2 clearancetoexposedcopper=TRUE
SilkToSolderMaskClearance "Silk to Solder Mask Opening" [All] p2: minsilkscreentomaskgap=2 clearancetoexposedcopper=FALSE
SolderMaskExpansion [All] p0: scope1count=1 scope1_0_kind=Board scope1_0_value=Board scope2count=1 scope2_0_kind=Board scope2_0_value=Board commentlength=0 expansion=1.97
SolderMaskExpansion [All] p1: expansion=1.97
UnRoutedNet [All] p0: scope1count=1 scope1_0_kind=Board scope1_0_value=Board scope2count=1 scope2_0_kind=Board scope2_0_value=Board commentlength=0
UnpouredPolygon [All] p0: scope1count=1 scope1_0_kind=Board scope1_0_value=Board scope2count=1 scope2_0_kind=Board scope2_0_value=Board commentlength=0
Width RF [All] p0: scope1count=1 scope1_0_kind=NetClass scope1_0_value=RF scope2count=1 scope2_0_kind=Board scope2_0_value=Board commentlength=0 maxlimit=100 minlimit=5.5 preferedwidth=10
Width [All] p0: scope1count=1 scope1_0_kind=Board scope1_0_value=Board scope2count=1 scope2_0_kind=Board scope2_0_value=Board commentlength=0 maxlimit=100 minlimit=4 preferedwidth=6
Width RF [InNetClass('RF')] p1: maxlimit=100 minlimit=5.5 preferedwidth=10 toplayer_prefwidth=12 midlayer1_minwidth=10 midlayer1_maxwidth=10 midlayer2_minwidth=10 midlayer2_maxwidth=10 midlayer3_minwidth=10 midlayer3_maxwidth=10 midlayer6_minwidth=10 midlayer6_maxwidth=10 midlayer7_minwidth=10 midlayer7_maxwidth=10 midlayer8_minwidth=10 midlayer8_maxwidth=10 bottomlayer_minwidth=10 bottomlayer_maxwidth=10 minimp=50.000000 maximp=50.000000 favimp=50.000000
Width [All] p2: maxlimit=100 minlimit=4 preferedwidth=6 toplayer_maxwidth=40 toplayer_prefwidth=6.7 midlayer1_minwidth=4.2 midlayer1_maxwidth=20 midlayer1_prefwidth=4.2 midlayer2_minwidth=4.5 midlayer2_maxwidth=15 midlayer2_prefwidth=5.95 midlayer7_minwidth=4.5 midlayer7_maxwidth=15 midlayer7_prefwidth=5.95 midlayer8_minwidth=6 midlayer8_prefwidth=10 bottomlayer_maxwidth=40 bottomlayer_prefwidth=6.7 minimp=50.000000 maximp=50.000000 favimp=50.000000
14 further rules are at their usual default settings.

## Classes and differential pairs
pad class "Non Plated": Designator1_2- Designator7_1- Designator22_1- Designator23- FL2-1 FL2-2 FL3-1 FL3-2 FL12-1 FL12-2 FL22-1 FL22-2 Free-
net class PWR: AR_1P0_RF1 AR_1P0_RF2 AR_1P2 AR_1V4_APLL AR_1V4_SYNTH AR_1V8 PMIC_1V0 PMIC_1V2 PMIC_1V8
net class 100E: AR_LVDS_0_N AR_LVDS_0_P AR_LVDS_1_N AR_LVDS_1_P AR_LVDS_CLK_N AR_LVDS_CLK_P AR_LVDS_FRCLK_N AR_LVDS_FRCLK_P
net class RF: NetA1_4 NetC22_1 NetC41_1 NetC93_1 NetC93_2 RF_N RF_P
component class PROC106B_RST_GPIOs_I2C: C6 C9 C10 C11 C12 C13 C38 C39 C72 C120 C125 J3 LD2 LD3 LD5 Q1 R13 R18 R38 R42 R51 R57 R67 R68 R69 R70 R71 R72 R73 R77 R78 R80 R81 R82 R93 R96 R97 R98 R107 R108 R111 R124 R125 R129 R177 R178 SW2 SW3 TP15 TP20 U5 U6 U7 U16 Y4
component class PROC106B_PMIC: C30 C31 C32 C33 C34 C44 C45 C46 C47 C48 C49 C50 C51 C52 C53 C54 C73 C75 C76 C77 C111 C112 C113 C121 C124 C131 L2 L3 L4 L5 L11 L12 L13 L14 LD1 R25 R26 R28 R31 R32 R33 R34 R35 R36 R37 R39 R50 R52 R53 R54 R55 R56 TP5 TP12 U1
component class PROC106B_HD_CONN_PWR_SW: C127 C128 C129 FL22 J2 J11 L16 R10 R11 R12 R14 R20 R24 R27 R29 R58 R88 R92 R130 R132 R133 R135 R137 R138 R140 R142 R143 R144 R145 R146 R147 R148 R149 R150 R151 R152 R153 R154 R155 R157 R186 R187 R188 R189 R190 RA1 RA2 RA3 RA4 RA5 RA6 RA7 RA8 RA9 TP10 TP13 U19
component class PROC106B_FLASH_USB_TO_UART: C1 C2 C3 C4 C100 C101 C126 D1 FL2 J1 LD4 R6 R15 R19 R40 R41 R43 R44 R45 R46 R47 R48 R49 R60 R61 R62 R63 R64 R65 TP18 TP19 TP26 U3 U9 U18
component class PROC106B_CAN_INTERFACE: C40 C43 C105 C106 C107 C108 C109 C110 FL3 FL12 J8 J10 R66 R74 R104 R105 R106 R114 R115 R116 R117 R118 R119 R120 R121 R122 R123 R126 R127 R128 R134 R136 R139 R141 U11 U12 U13 U17
component class PROC106B_BT_DISPLAY: A1 C5 C7 C8 C15 C16 C17 C18 C19 C20 C21 C22 C23 C24 C25 C26 C27 C28 C29 C35 C36 C37 C41 C86 C93 C99 C104 C114 C115 C116 C117 C118 C119 J4 J6 J7 L1 L6 L7 L8 L9 L10 LD6 R17 R30 R76 R79 R86 R87 R89 R90 R91 R94 R95 R99 R100 R101 R102 R110 R112 R113 R131 R160 R161 R166 R168 R180 R181 R182 R183 R184 R185 TP16 TP27 TP46 U4 U8 U10 U14 Y2 Y3
component class PROC106B_AOP_PWR: C55 C56 C57 C58 C59 C60 C61 C62 C63 C64 C65 C66 C67 C68 C69 C70 C74 C78 C79 C80 C81 C82 C83 C84 C85 C87 C88 C89 C90 C91 C92 C94 C95 C96 C97 C98 C102 C103 TP11
component class PROC106B_AOP_IO: C14 C71 C130 R2 R3 R4 R5 R7 R8 R9 R21 R22 R23 R59 R75 R83 R84 R85 R103 R158 R159 R170 R171 R172 R174 R176 S3 TP2 TP3 TP6 TP7 TP8 TP9 TP14 TP17 U2 Y1
component class PROC106B_ANALOG_MUX: C42 C122 C123 J5 L15 R1 R16 S1 S2 TP4 U15
component class PROC106B_Hardware: FID1 FID2 FID3 FID4 FID5 FID6 ZZ1 ZZ2 ZZ3 ZZ4 ZZ5.1 ZZ5.2
component class FiducialMark: Designator1_2 Designator7_1 Designator22_1 Designator23 FID1 FID2 FID3 FID4 FID5 FID6
component class AssemblyNote: ZZ1 ZZ2 ZZ3 ZZ4 ZZ5.1 ZZ5.2
differential pair NewDifferentialPair3: +X48M_P -X48M_N
differential pair AR_LVDS_CLK_J: +NetJ2_36 -NetJ2_34
differential pair AR_LVDS_1_J: +NetJ2_42 -NetJ2_40
differential pair AR_LVDS_0_J: +NetJ2_48 -NetJ2_46
differential pair USB_R: +NetR60_1 -NetR41_1
differential pair NewDifferentialPair1: +NetJ8_1 -NetJ8_3
differential pair USB: +USB_DP -USB_DM
differential pair NewDifferentialPair2: +NetJ10_1 -NetJ10_3
differential pair AR_LVDS_CLK: +AR_LVDS_CLK_P -AR_LVDS_CLK_N
differential pair AR_LVDS_FRCLK: +AR_LVDS_FRCLK_P -AR_LVDS_FRCLK_N
differential pair AR_LVDS_1: +AR_LVDS_1_P -AR_LVDS_1_N
differential pair AR_LVDS_0: +AR_LVDS_0_P -AR_LVDS_0_N
differential pair AR_LVDS_0_R: +NetJ11_56 -NetJ11_58
differential pair AR_LVDS_1_R: +NetJ11_50 -NetJ11_52
differential pair AR_LVDS_CLK_R: +NetJ11_44 -NetJ11_46
differential pair " ": +NetJ11_26 -NetJ11_28

## Components (designator, comment, footprint, x,y, rotation, side; value= is the part's Value field where it differs from the comment)
A1 "ANT016008LCS2442MA2" FP-ANT016008LCS2442MA2_SMT_ANT-0 7284.33,4589.83 r180 top
C1 "GCM21BR71A106KE22L" 0805L 3004.01,3914.32 r270 top
C2 "GCM155R71C104KA55D" 0402L 3005.89,4400.66 r180 bottom
C3 "GCM155R71C104KA55D" 0402L 3005.89,4400.66 r180 top
C4 "GCM21BR71A106KE22L" 0805L 3004.01,3914.26 r90 bottom
C5 "CL03A105MO3NRNH" FP-CL03A105MO3NRNH_0201-IPC_C 6882.81,3977 r180 bottom
C6 "GRM033R6YA104KE14D" "FP-GRM033R6YA104KE14D_0201 (0603 Metric)-IPC_C" 5234.38,4538.7 r90 bottom
C7 "CL05A106MP5NUNC" 0402_070 6844.78,3720.79 r0 bottom
C8 "CL03A103KA3NNNC" FP-CL03A103KA3NNNC_0201-IPC_C 6903.19,3719.01 r180 bottom
C9 "GRM033R6YA104KE14D" "FP-GRM033R6YA104KE14D_0201 (0603 Metric)-IPC_C" 5197.1,3791.56 r90 bottom locked
C10 "GRM033R6YA104KE14D" "FP-GRM033R6YA104KE14D_0201 (0603 Metric)-IPC_C" 5162.69,3875.17 r90 bottom
C11 "CL03A105MO3NRNH" FP-CL03A105MO3NRNH_0201-IPC_C 5172.1,3791.41 r270 bottom
C12 "GRM033R6YA104KE14D" "FP-GRM033R6YA104KE14D_0201 (0603 Metric)-IPC_C" 5580.92,3737.11 r0 bottom
C13 "GRM033R6YA104KE14D" "FP-GRM033R6YA104KE14D_0201 (0603 Metric)-IPC_C" 5242.93,4010.48 r0 bottom
C14 "CGA1A2C0G1H4R7C030BA" FP-CGA1A2C0G1H4R7C030BA_0201-IPC_C 4153.98,3817.27 r180 top
C15 "CL03A105MO3NRNH" FP-CL03A105MO3NRNH_0201-IPC_C 4750.21,4143.82 r270 top
C16 "CL03A105MO3NRNH" FP-CL03A105MO3NRNH_0201-IPC_C 4713.47,4143.92 r270 top
C17 "GRM0335C1H8R0BA01D" "FP-GRM0335C1H8R0BA01D_0201 (0603 metric)-IPC_C" 6613.33,4250.88 r0 top
C18 "GRM0335C1H8R0BA01D" "FP-GRM0335C1H8R0BA01D_0201 (0603 metric)-IPC_C" 6634.87,4127.04 r180 top
C19 "250R05L120JV4T" FP-250R05L120JV4T_0201-IPC_C 6277.6,4370.87 r270 top
C20 "250R05L120JV4T" FP-250R05L120JV4T_0201-IPC_C 6277.6,4324.98 r90 top
C21 "CL05C120JB5NNNC" 0402L 6540.73,4344.09 r270 top
C22 "GCM1555C1H1R0CA16D" 0402L 6468.51,4395.47 r270 top
C23 "GCM1555C1H1R0CA16D" 0402L 6395.4,4324.42 r180 top
C24 "CL03A105MO3NRNH" FP-CL03A105MO3NRNH_0201-IPC_C 6142.33,4003.46 r180 top
C25 "GRM033R6YA104KE14D" "FP-GRM033R6YA104KE14D_0201 (0603 Metric)-IPC_C" 6157.34,4271.39 r180 top
C26 "GRM033R6YA104KE14D" "FP-GRM033R6YA104KE14D_0201 (0603 Metric)-IPC_C" 6142.18,4042.21 r180 top
C27 "GRM033R6YA104KE14D" "FP-GRM033R6YA104KE14D_0201 (0603 Metric)-IPC_C" 6518.42,4103.16 r270 top
C28 "CL05A226MQ5N6J8" 0402S 6458.05,3903.24 r0 top
C29 "CL05A226MQ5N6J8" 0402S 6471.97,4137.37 r180 bottom
C30 "GCM155R71C224KE02D" 0402L 3295.87,4189 r90 top
C31 "CGA2B2C0G1H391J050BA" 0402L 3667.5,4538.34 r180 top
C32 "CGA2B2C0G1H391J050BA" 0402L 3200.34,4518.49 r0 top
C33 "CGA2B2C0G1H391J050BA" 0402L 3615.39,4098.42 r270 top
C34 "CGA2B2C0G1H391J050BA" 0402L 3231.35,3936.68 r270 top
C35 "GRM033R6YA104KE14D" "FP-GRM033R6YA104KE14D_0201 (0603 Metric)-IPC_C" 6534.66,4138.22 r0 top
C36 "GRM033R6YA104KE14D" "FP-GRM033R6YA104KE14D_0201 (0603 Metric)-IPC_C" 6516.27,4239.23 r90 top
C37 "GRM033R6YA104KE14D" "FP-GRM033R6YA104KE14D_0201 (0603 Metric)-IPC_C" 6287.19,4411.08 r180 top
C38 "250R05L120JV4T" FP-250R05L120JV4T_0201-IPC_C 5245.41,3795.56 r180 bottom
C39 "250R05L120JV4T" FP-250R05L120JV4T_0201-IPC_C 5291.16,3795.56 r0 bottom
C40 "GRM033R6YA104KE14D" "FP-GRM033R6YA104KE14D_0201 (0603 Metric)-IPC_C" 6581.1,4040.29 r180 top
C41 "GCM1555C1H1R0CA16D" 0402L 6461.93,4540.91 r0 top
C42 "CL05A106MP5NUNC" 0402_070 6821.81,4040 r90 top
C43 "GRM033R6YA104KE14D" "FP-GRM033R6YA104KE14D_0201 (0603 Metric)-IPC_C" 5891.78,4292.07 r0 top
C44 "CGA4J1X7T0J226M125AC" FP-CGA4J1X7T0J226M125AC_0805-MFG 3516.1,4538.33 r0 top
C45 "CGA4J1X7T0J226M125AC" FP-CGA4J1X7T0J226M125AC_0805-MFG 3336.18,4538.34 r180 top
C46 "CGA4J1X7T0J226M125AC" FP-CGA4J1X7T0J226M125AC_0805-MFG 3514.81,3840.95 r0 top
C47 "CGA4J1X7T0J226M125AC" FP-CGA4J1X7T0J226M125AC_0805-MFG 3335.76,3832.63 r180 top
C48 "CGA4J1X7T0J226M125AC" FP-CGA4J1X7T0J226M125AC_0805-MFG 3335.76,3750.6 r180 top
C49 "CGA4J1X7T0J226M125AC" FP-CGA4J1X7T0J226M125AC_0805-MFG 3514.81,3770.11 r0 top
C50 "GCM21BR71A106KE22L" 0805_HV1 3355.89,4015.14 r0 top
C51 "GCM21BR71A106KE22L" 0805_HV1 3495.89,4015.14 r180 top
C52 "GCM21BR71A106KE22L" 0805_HV1 3357.86,4352.35 r0 top
C53 "GCM21BR71A106KE22L" 0805_HV1 3495.89,4352.35 r180 top
C54 "CGA4J1X7T0J226M125AC" FP-CGA4J1X7T0J226M125AC_0805-MFG 3514.81,3699.04 r0 top
C55 "GCM21BR71A106KE22L" 0805L 3908.19,4239.7 r0 bottom
C56 "GCM155R71C224KE02D" 0402L 4323.95,4419.07 r0 bottom
C57 "GCM155R71C224KE02D" 0402L 3686.18,4257.19 r180 top
C58 "GCM155R71C224KE02D" 0402L 3686.18,4218.19 r180 top
C59 "GCM21BR71A106KE22L" 0805L 3700.56,4275.26 r90 bottom
C60 "GCM155R71C224KE02D" 0402L 4309.75,4188.46 r90 bottom
C61 "GCM155R71C224KE02D" 0402L 4018.33,4342.22 r270 bottom
C62 "GCM21BR71A106KE22L" 0805L 4040,3970.52 r90 bottom
C63 "GCM155R71C224KE02D" 0402L 3935.07,3856.83 r180 bottom
C64 "GCM155R71C224KE02D" 0402L 3967.69,3945.83 r180 bottom
C65 "GCM21BR71A106KE22L" 0805L 3674.97,3943.67 r180 bottom
C66 "GCM155R71C224KE02D" 0402L 3865.49,3945.78 r90 bottom
C67 "GCM155R71C224KE02D" 0402L 3790.94,3955.68 r0 bottom
C68 "GCM155R71C224KE02D" 0402L 3713.57,3943.79 r90 top
C69 "CGA2B3X7R1H473K050BB" 0402L 3822.75,3862.61 r180 bottom
C70 "GCM21BR71A106KE22L" 0805L 3908.19,4023.7 r0 bottom
C71 "CGA1A2C0G1H4R7C030BA" FP-CGA1A2C0G1H4R7C030BA_0201-IPC_C 4106.98,3817.45 r180 top
C72 "GRM033R6YA104KE14D" "FP-GRM033R6YA104KE14D_0201 (0603 Metric)-IPC_C" 4845,4415.28 r0 top
C73 "CGA4J1X7T0J226M125AC" FP-CGA4J1X7T0J226M125AC_0805-MFG 3299.16,3669 r180 top
C74 "GCM188R70J225KE22D" 0603L 3687.18,4009.15 r180 top
C75 "CGA4J1X7T0J226M125AC" FP-CGA4J1X7T0J226M125AC_0805-MFG 3702.01,3803.74 r0 bottom
C76 "GCM21BR71A106KE22L" 0805L 3427.48,4623.45 r0 bottom
C77 "CGA4J1X7T0J226M125AC" FP-CGA4J1X7T0J226M125AC_0805-MFG 3136,4614 r0 top
C78 "GCM21BR71A106KE22L" 0805L 3908.19,4167.7 r0 bottom
C79 "GCM188R70J225KE22D" 0603L 3710.6,4167.45 r90 bottom
C80 "GCM155R71C224KE02D" 0402L 3686.2,4141.13 r180 top
C81 "GCM155R71C224KE02D" 0402L 3686.2,4177.66 r180 top
C82 "GCM21BR71A106KE22L" 0805L 3908.19,4095.7 r0 bottom
C83 "GCM188R70J225KE22D" 0603L 3655.22,4120.08 r90 bottom
C84 "GCM155R71C224KE02D" 0402L 3687.73,4060.46 r180 top
C85 "GCM155R71C224KE02D" 0402L 3687.73,4097.51 r180 top
C86 "GRM033R6YA104KE14D" "FP-GRM033R6YA104KE14D_0201 (0603 Metric)-IPC_C" 6410.84,3907.91 r270 top
C87 "GCM155R71C224KE02D" 0402L 4314.32,4094.43 r270 bottom
C88 "GCM155R71C224KE02D" 0402L 4085.98,4438.9 r90 bottom
C89 "GCM188R71C105KA64D" 0603L 4132.97,3811.96 r0 bottom
C90 "GCM188R71C105KA64D" 0603L 4028.67,3857.43 r180 bottom
C91 "GCM155R71C104KA55D" 0402L 4218.02,4377.65 r90 bottom
C92 "GCM155R71C104KA55D" 0402L 4352.69,4188.46 r270 bottom
C93 "CL05C120JB5NNNC" 0402L 6586.38,4589.83 r180 top
C94 "GCM155R71C224KE02D" 0402L 4364,3874.31 r270 bottom
C95 "GCM155R71C224KE02D" 0402L 4376.53,3958.4 r270 bottom
C96 "GCM155R71C224KE02D" 0402L 4094.31,4356.14 r270 bottom
C97 "GCM155R71C224KE02D" 0402L 4188.97,3908.47 r90 bottom
C98 "GCM155R71C224KE02D" 0402L 3918.65,4396.76 r0 bottom
C99 "GJM1555C1H1R8BB01D" 0402L 7156.66,4589.69 r180 top
C100 "GCM188R71C105KA64D" 0603L 3220.18,4028.4 r90 top
C101 "GCM155R71C104KA55D" 0402L 3257.08,4075.84 r270 bottom
C102 "GCM188R70J225KE22D" 0603L 4367.44,4062.4 r270 bottom
C103 "GCM188R70J225KE22D" 0603L 4150.97,4365.07 r270 bottom
C104 "GJM1555C1H1R8BB01D" 0402L 7217.64,4570.15 r270 top
C105 "GRM033R6YA104KE14D" "FP-GRM033R6YA104KE14D_0201 (0603 Metric)-IPC_C" 6003.64,4429.32 r90 top
C106 "GRM155R71H472KA01D" 0402L 6042.33,4472.32 r90 top
C107 "GRM033R6YA104KE14D" "FP-GRM033R6YA104KE14D_0201 (0603 Metric)-IPC_C" 6735.03,4433.22 r90 top
C108 "GRM033R6YA104KE14D" "FP-GRM033R6YA104KE14D_0201 (0603 Metric)-IPC_C" 6709.78,3866.01 r270 top
C109 "GRM033R6YA104KE14D" "FP-GRM033R6YA104KE14D_0201 (0603 Metric)-IPC_C" 6877.41,3768.9 r0 top
C110 "GRM155R71H472KA01D" 0402L 6951.81,3773.61 r90 top
C111 "CGA4J1X7T0J226M125AC" FP-CGA4J1X7T0J226M125AC_0805-MFG 3639.35,3729.75 r180 bottom
C112 "GCM21BR71A106KE22L" 0805L 3109.68,3663.43 r180 top
C113 "GCM21BR71A106KE22L" 0805L 3638.2,3839.06 r90 top
C114 "GRM033R6YA104KE14D" "FP-GRM033R6YA104KE14D_0201 (0603 Metric)-IPC_C" 6174.57,3747.34 r180 bottom
C115 "CL03A105MO3NRNH" FP-CL03A105MO3NRNH_0201-IPC_C 5764.72,3872.2 r0 top
C116 "CL03A105MO3NRNH" FP-CL03A105MO3NRNH_0201-IPC_C 5764.72,3843.74 r0 top
C117 "GRM033R6YA104KE14D" "FP-GRM033R6YA104KE14D_0201 (0603 Metric)-IPC_C" 6050.15,3984.72 r90 top
C118 "GRM033R6YA104KE14D" "FP-GRM033R6YA104KE14D_0201 (0603 Metric)-IPC_C" 6272.5,3733.87 r270 bottom
C119 "GRM033R6YA104KE14D" "FP-GRM033R6YA104KE14D_0201 (0603 Metric)-IPC_C" 6304.91,3909.21 r90 bottom
C120 "GRM033R6YA104KE14D" "FP-GRM033R6YA104KE14D_0201 (0603 Metric)-IPC_C" 4905.18,4369.7 r0 top
C121 "GCM21BR71A106KE22L" 0805L 3541.25,3686.2 r270 bottom
C122 "CL05A106MP5NUNC" 0402_070 6771.81,4040 r270 top
C123 "GRM033R6YA104KE14D" "FP-GRM033R6YA104KE14D_0201 (0603 Metric)-IPC_C" 5580.17,4531.94 r270 top
C124 "CGA4J1X7T0J226M125AC" FP-CGA4J1X7T0J226M125AC_0805-MFG 3702.01,3871.27 r0 bottom